# Altium PCB FogCalBoard.PcbDoc (part 1 of 2)
Units mil, origin at the board's own origin, x right, y up, seen from the top; angles counter-clockwise.
Board outline 2750 x 2750 mil, 4 copper layers (Top Layer, Middle 1 Layer, Middle 2 Layer, Bottom Layer), stack 53.912 mil thick; 111 components, 90 nets, 358 pads, 105 vias.
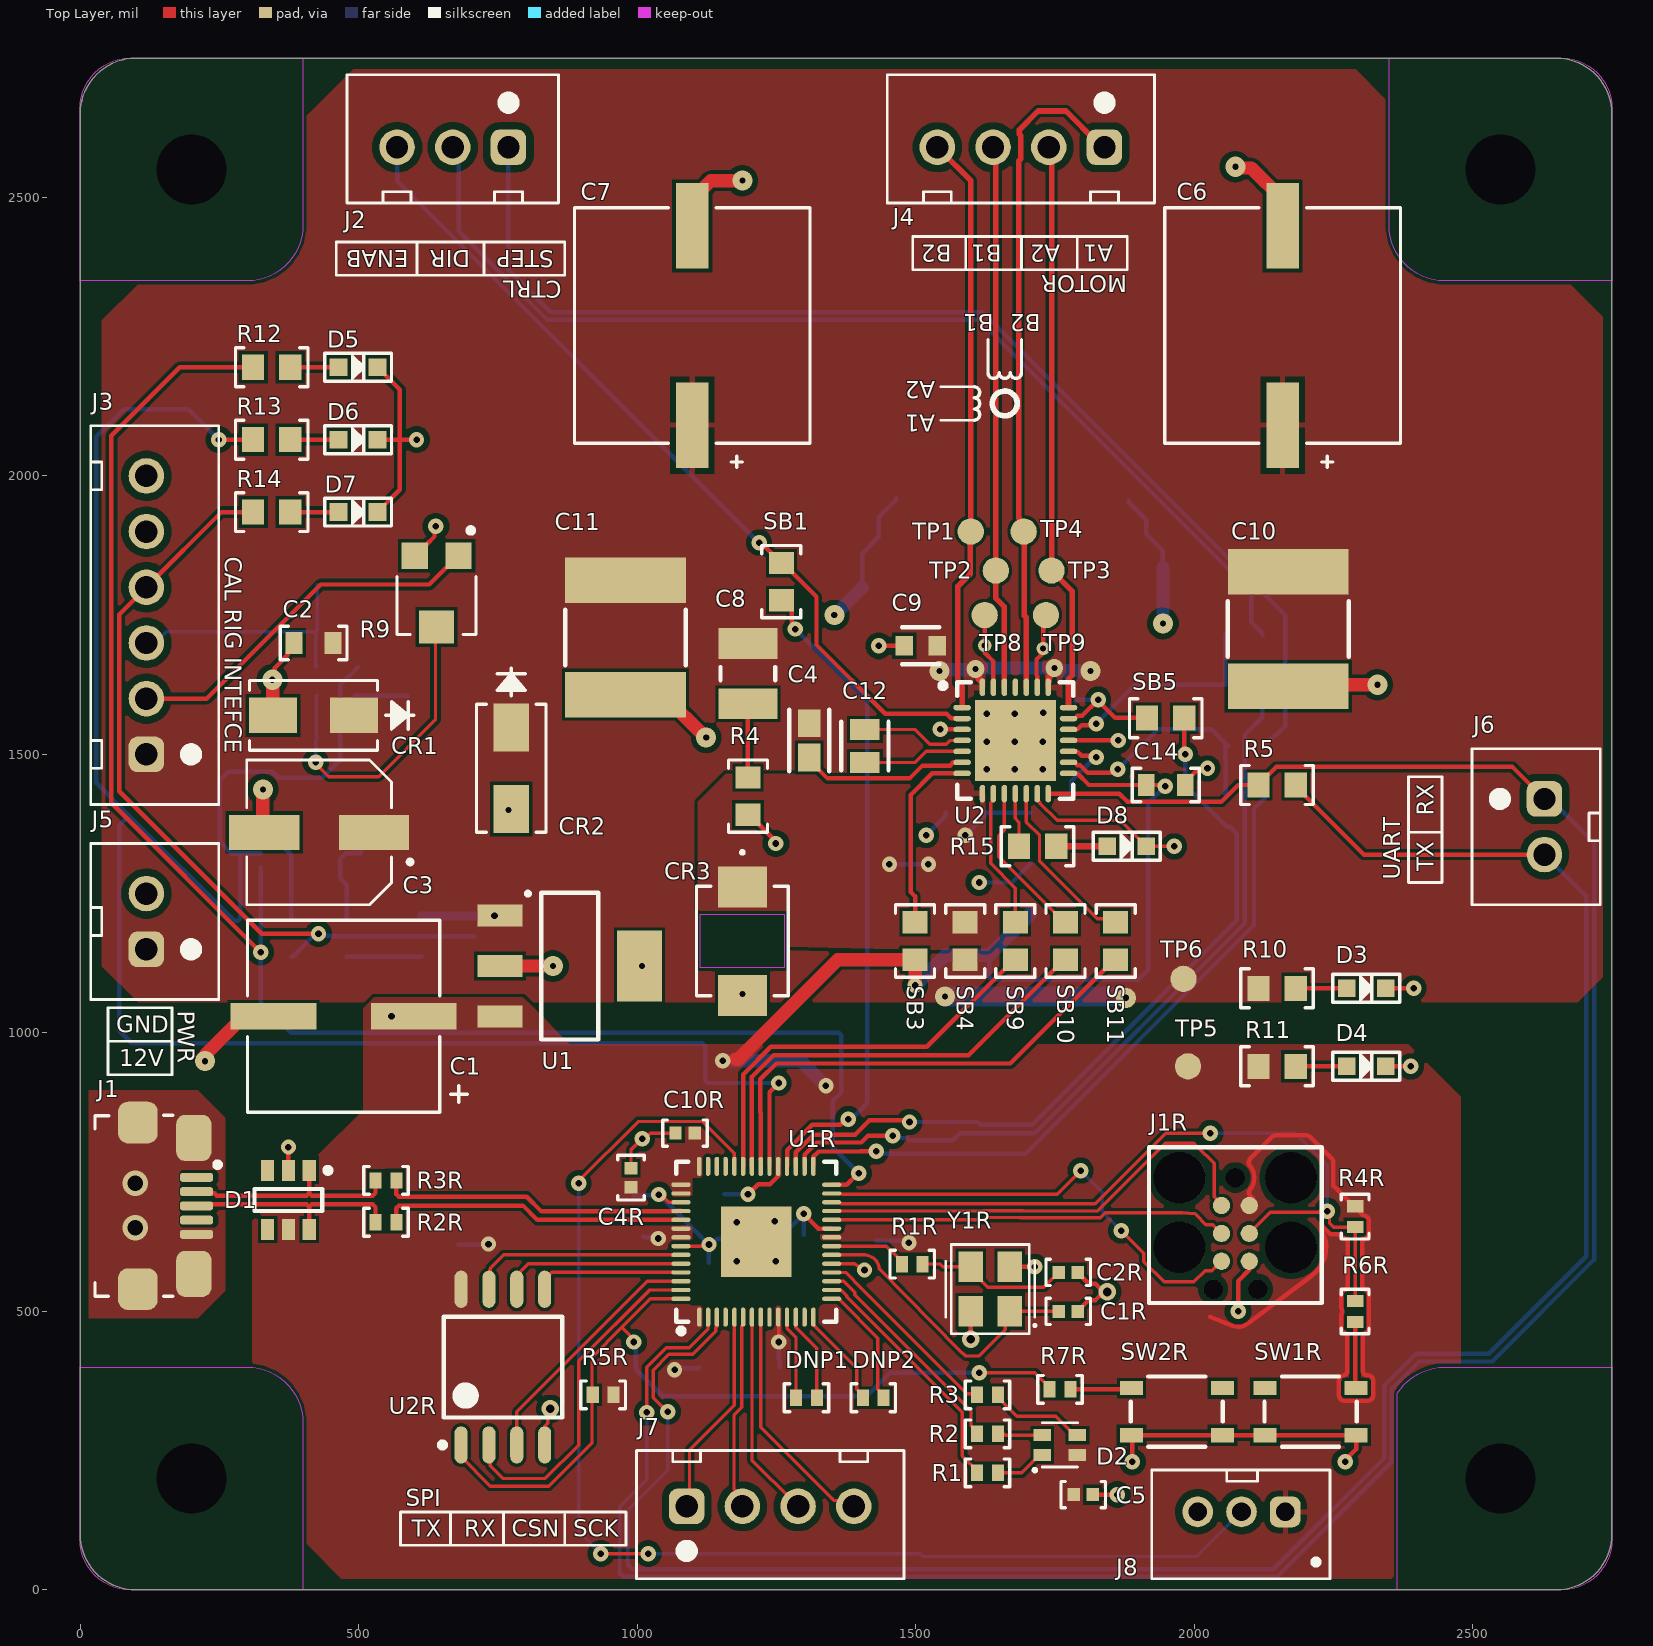
[diagram p0: Top Layer view]
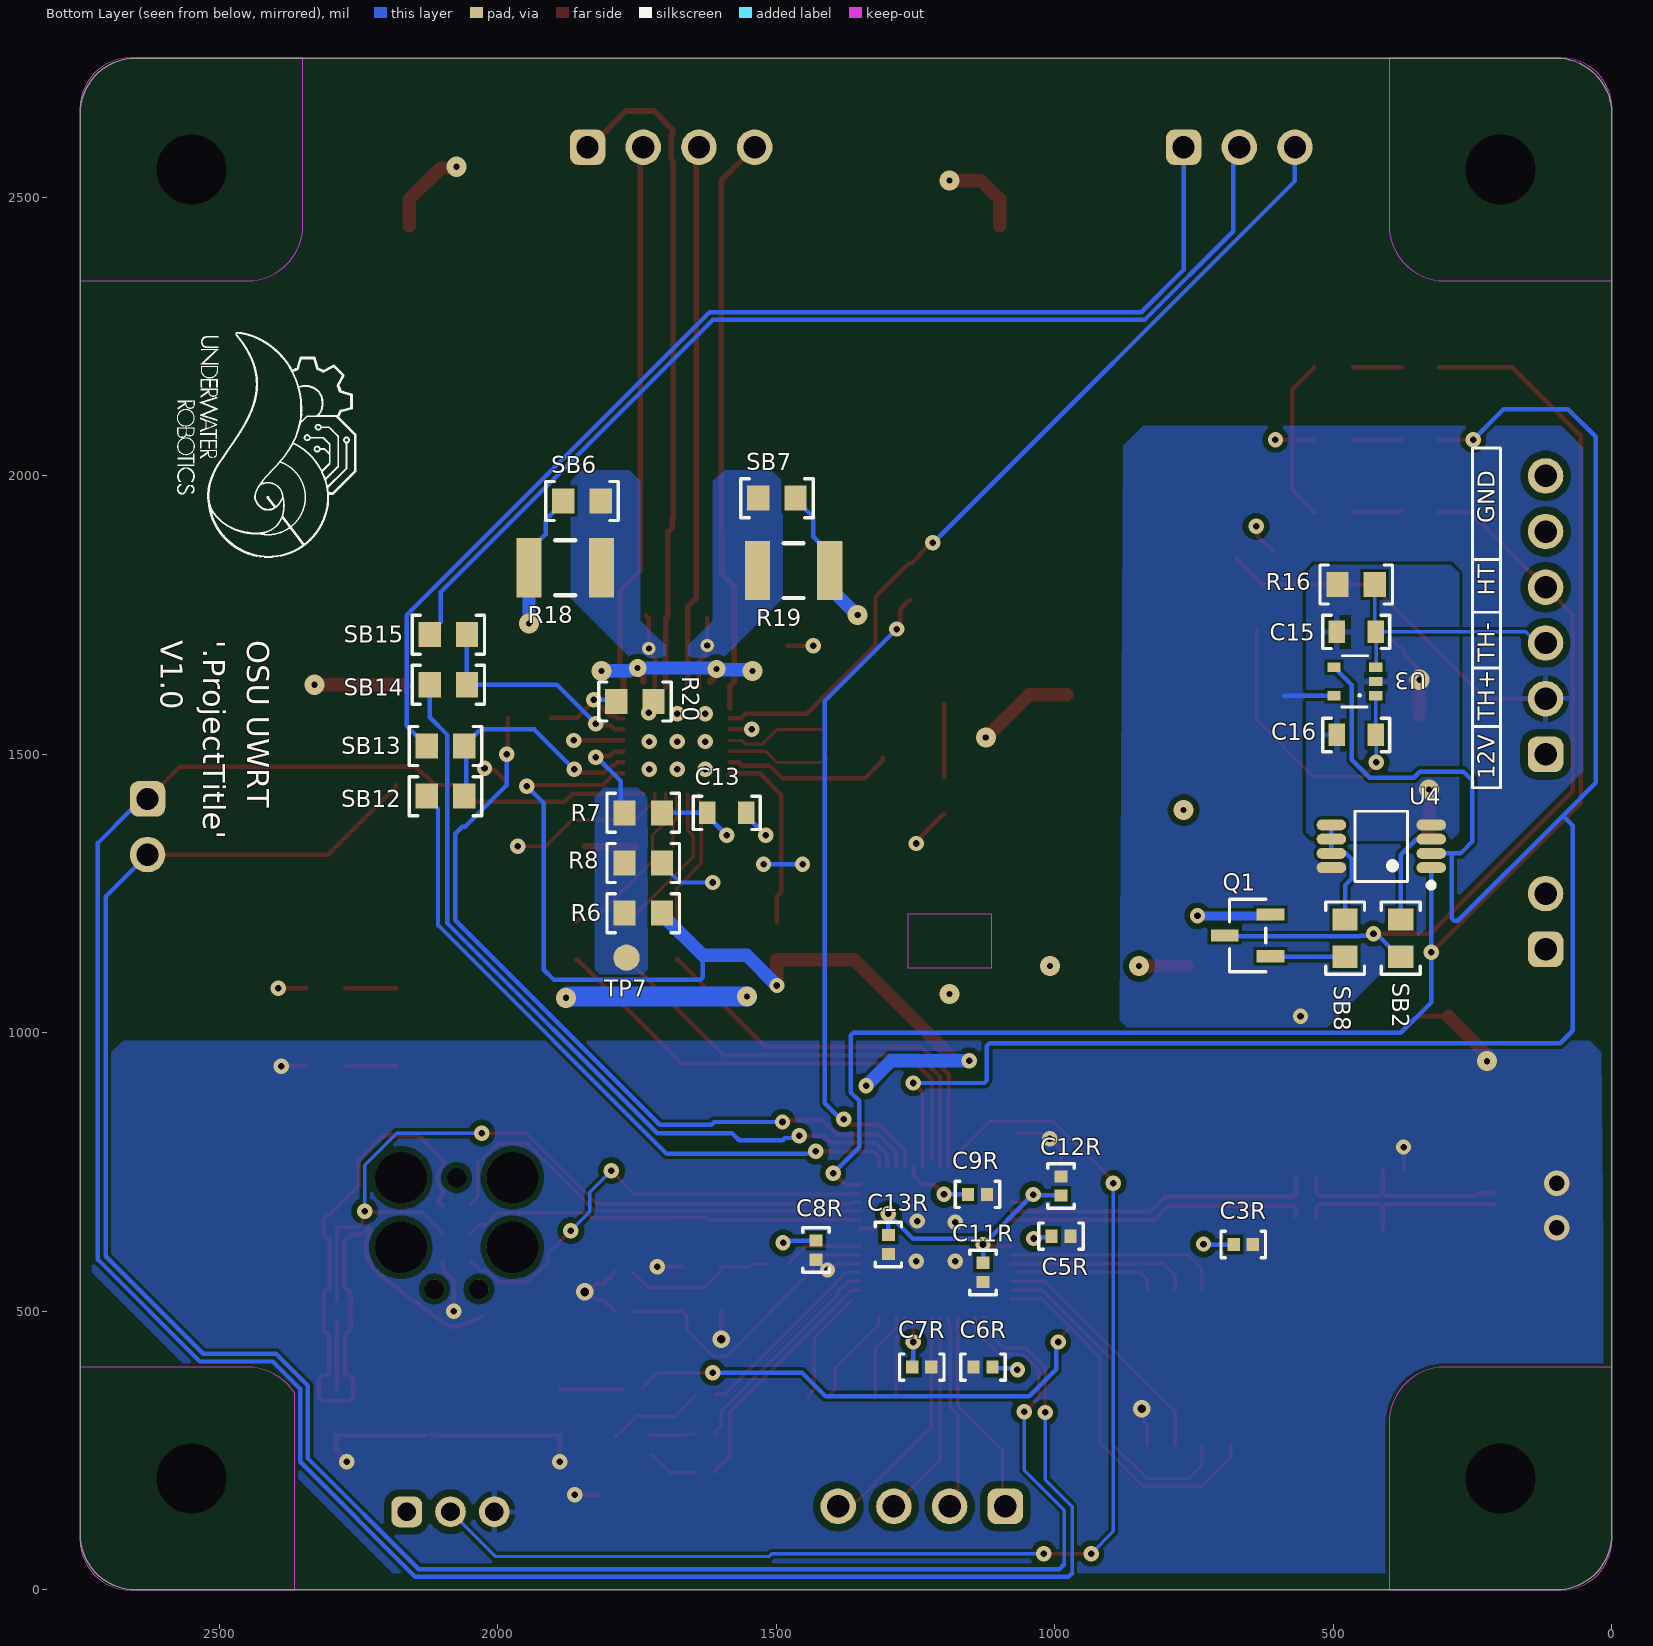
[diagram p1: Bottom Layer view, seen from below]
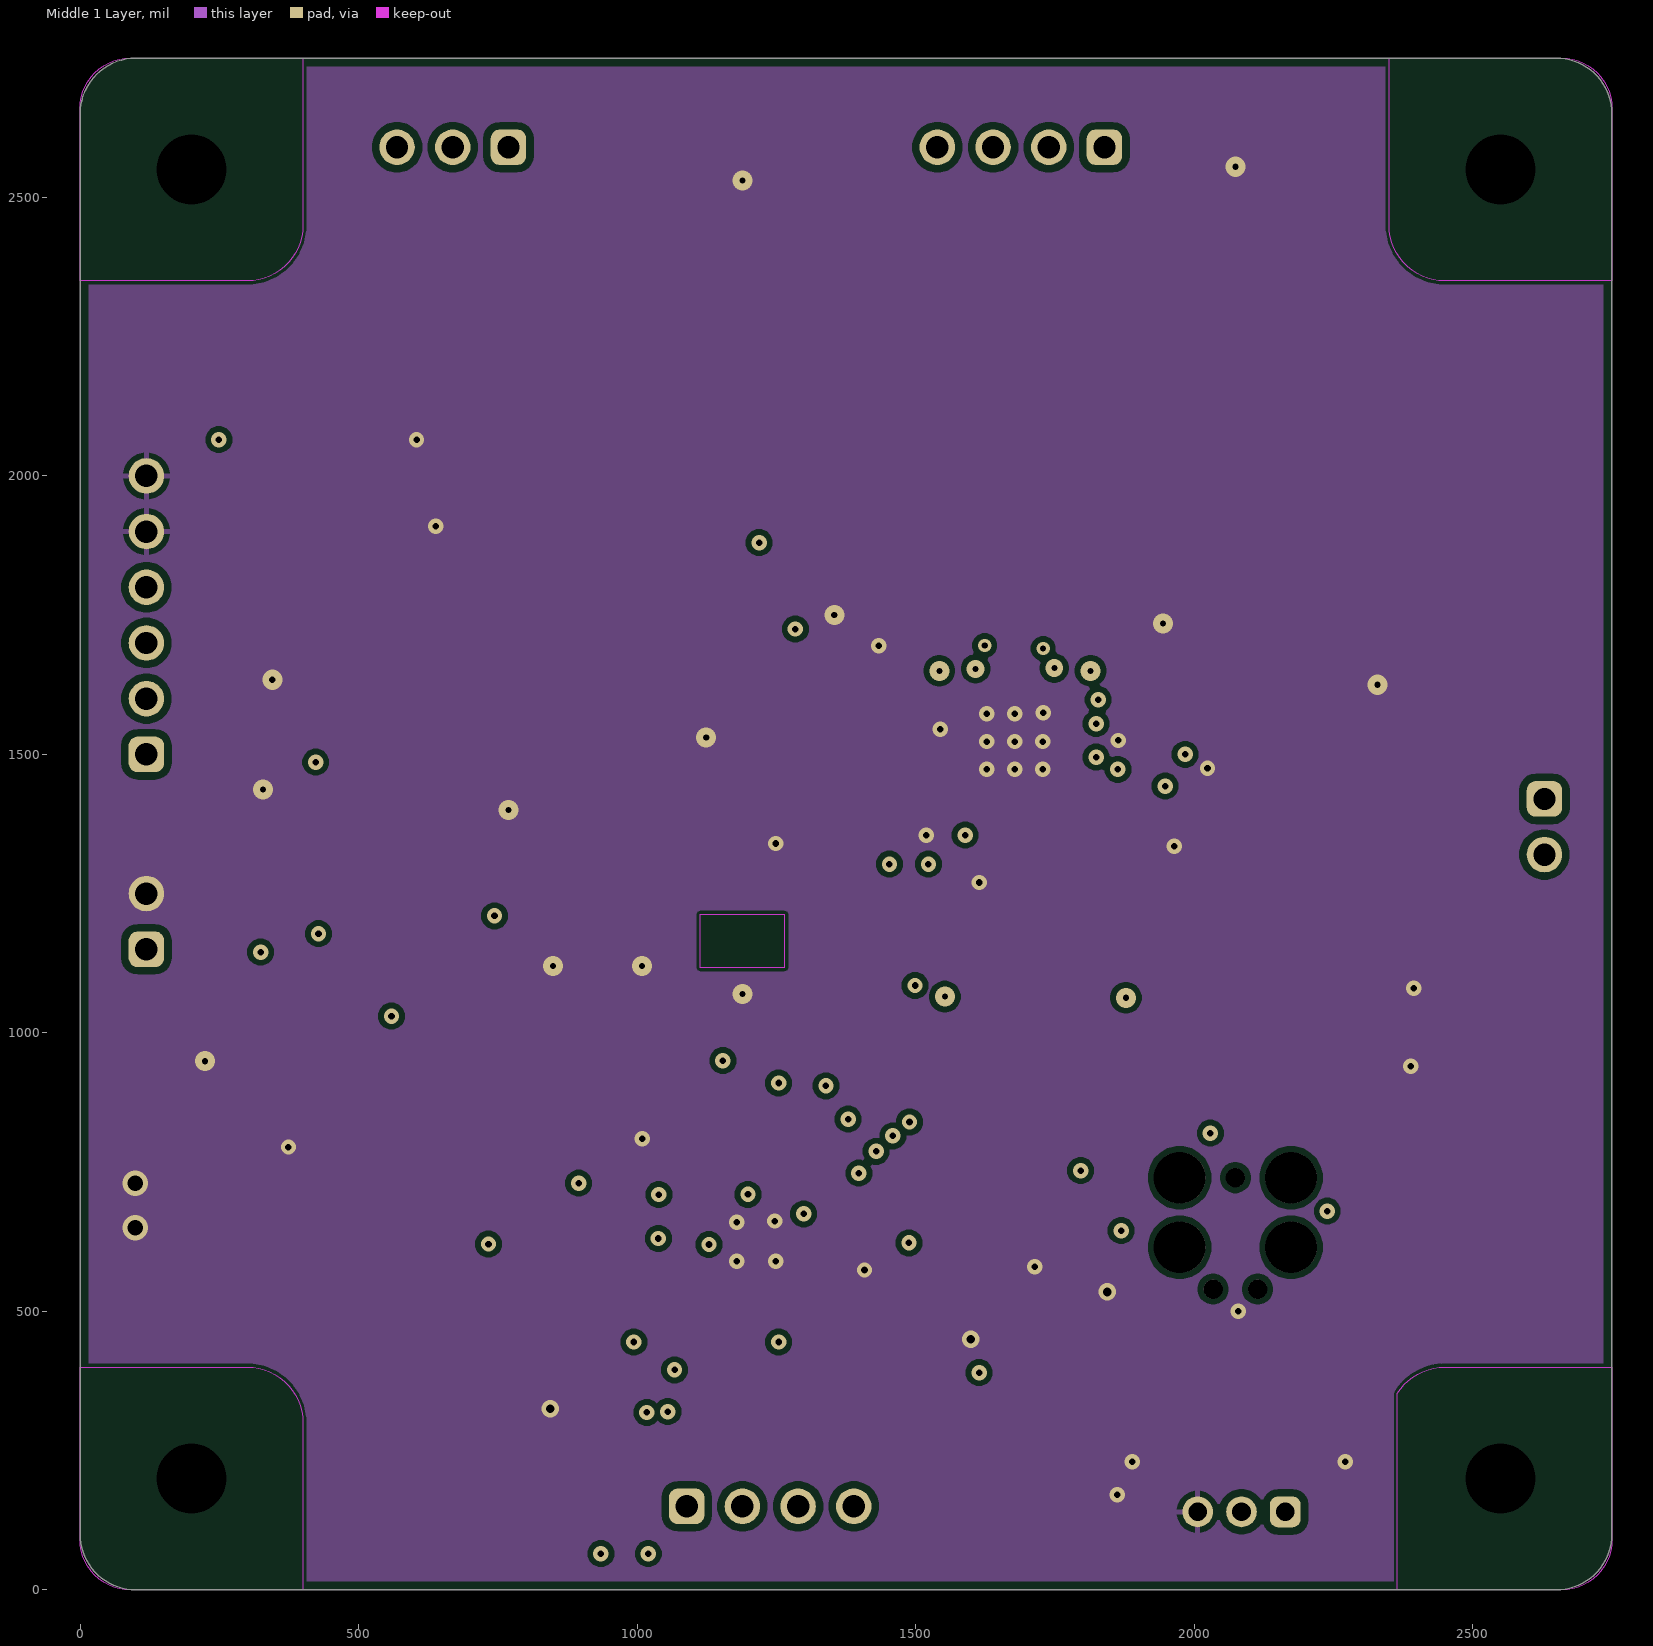
[diagram p2: Middle 1 Layer]
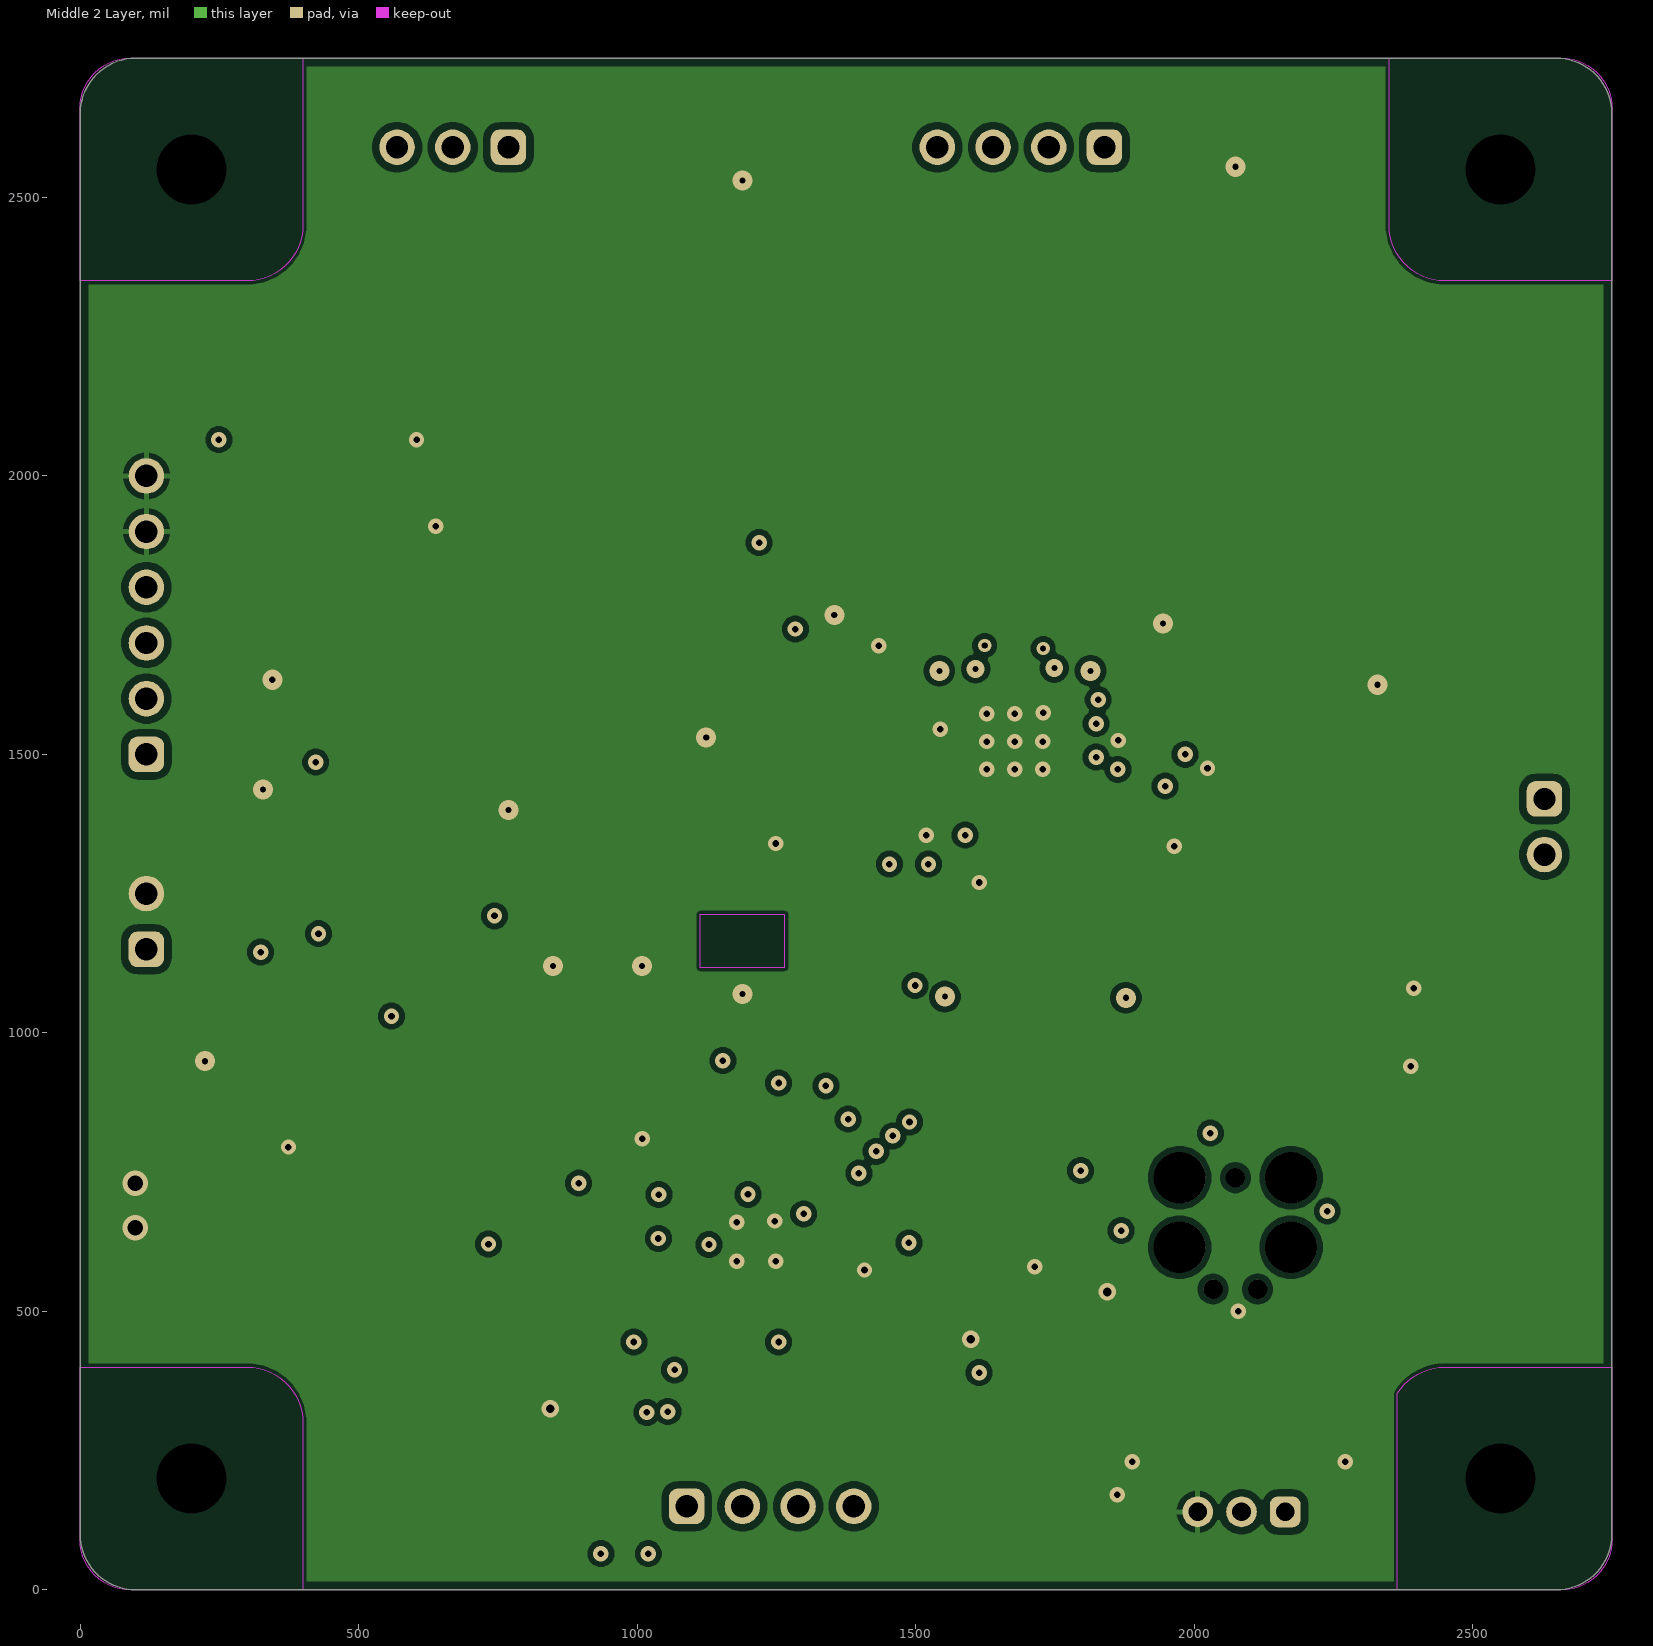
[diagram p3: Middle 2 Layer]
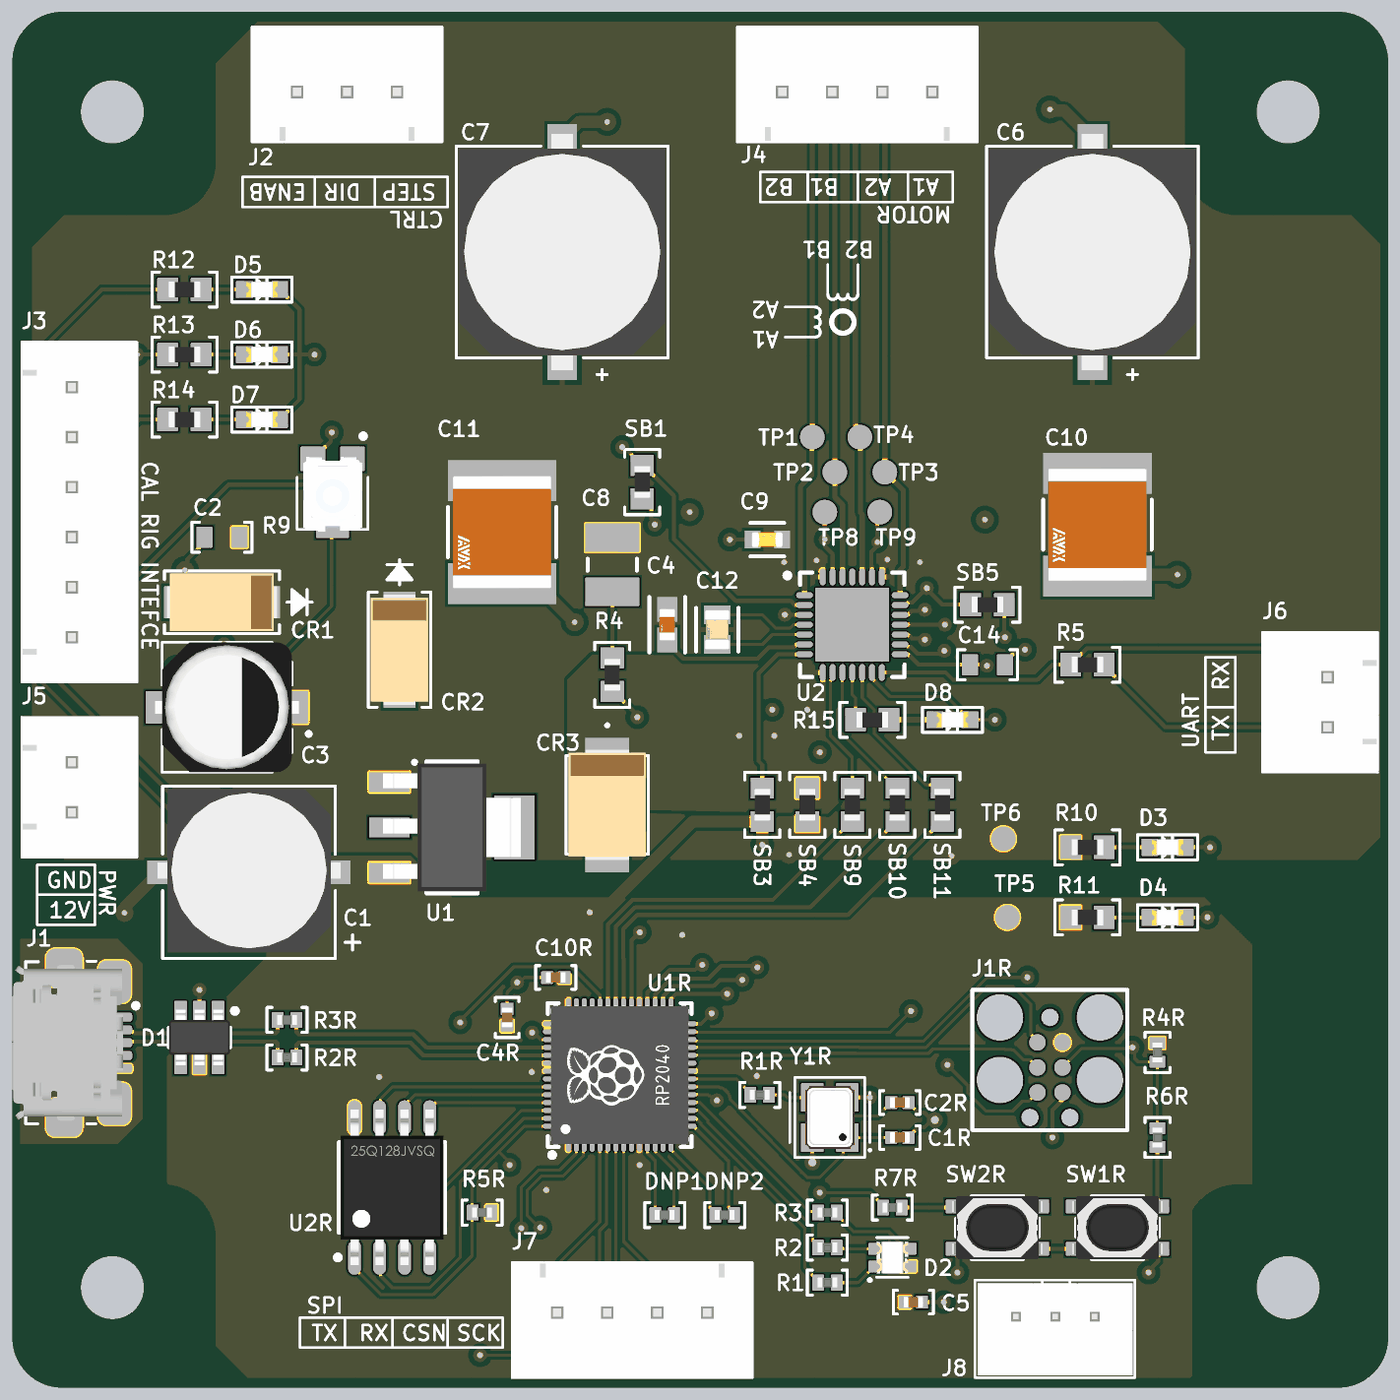
[diagram p5: 3D render of the assembled board from above, using the file's embedded part models]
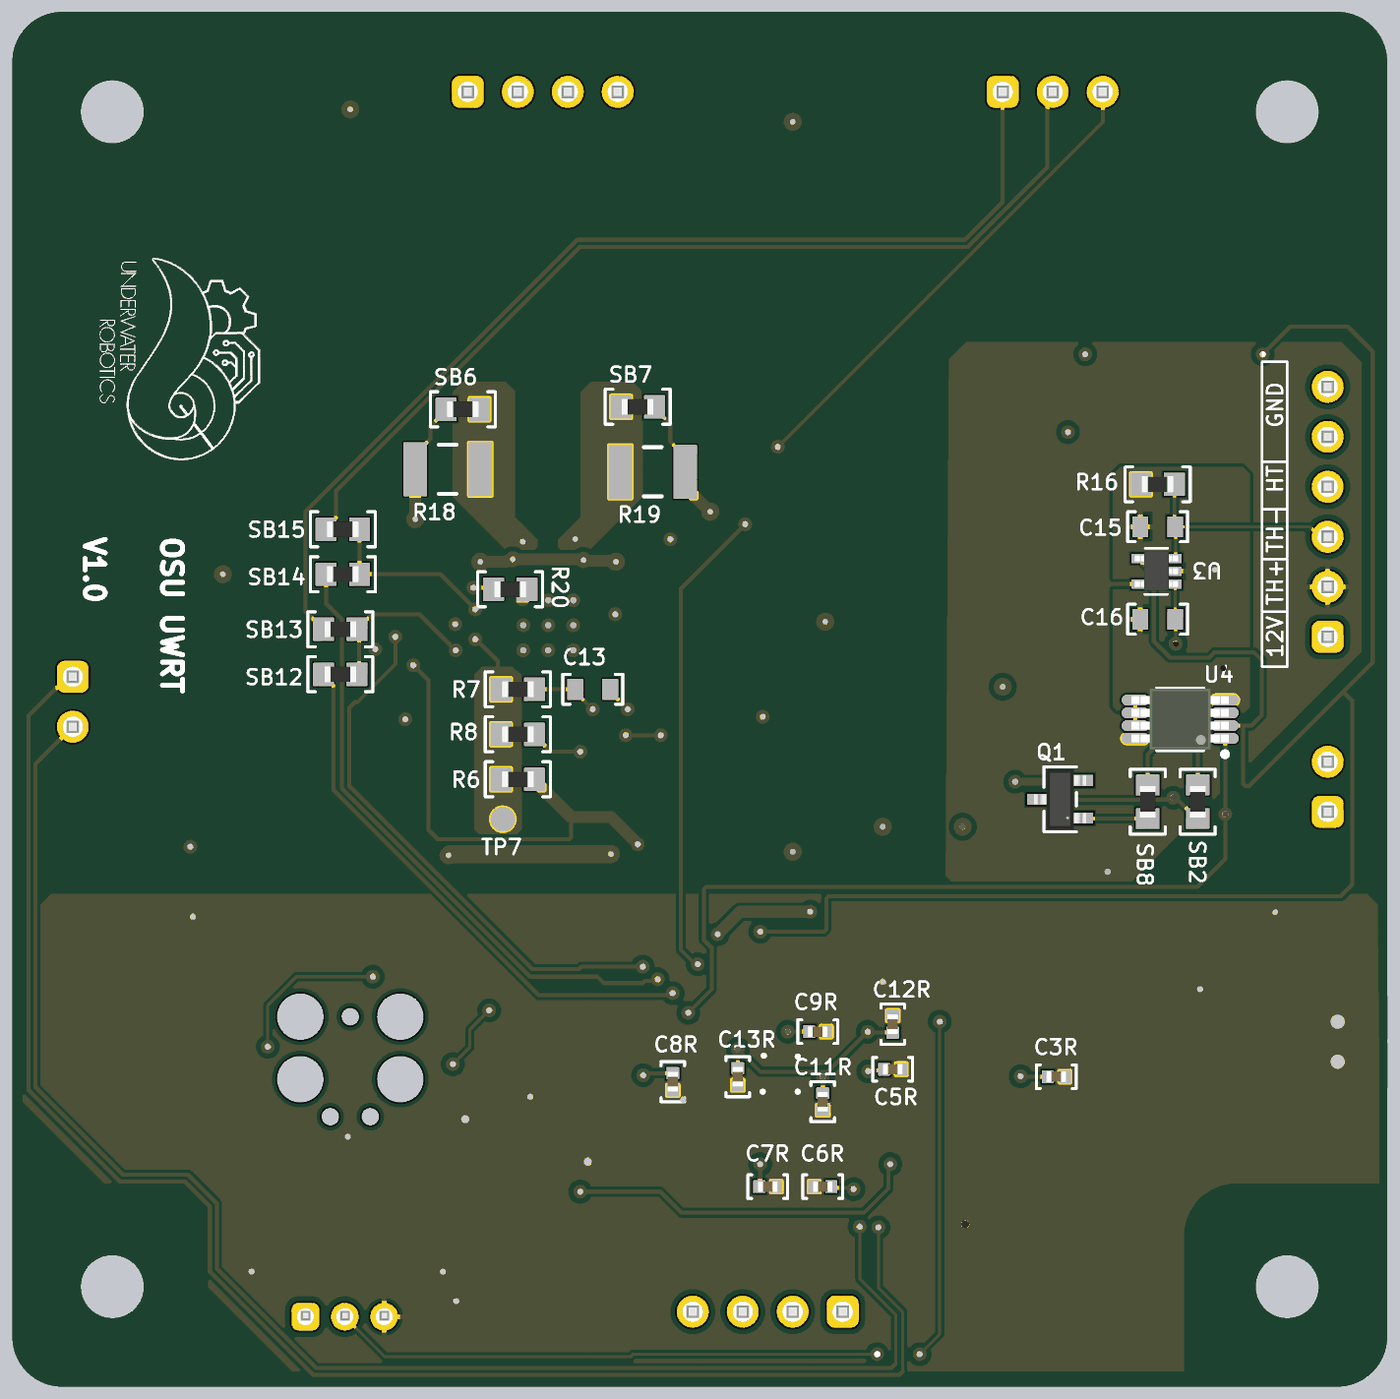
[diagram p6: 3D render of the assembled board from below, using the file's embedded part models]

## Layer stack, top to bottom
Top Solder: solder mask 1, SM-001, Dk 4
Top Layer: signal copper 1.378
Dielectric 1: prepreg 5.1, PP-017, Dk 4.3
Dielectric 2: prepreg 5.1, PP-017, Dk 4.3
Middle 1 Layer: signal copper 1.378
Dielectric 3: core 28, Core-039, Dk 4.8
Middle 2 Layer: signal copper 1.378
Dielectric 4: prepreg 5.1, PP-017, Dk 4.3
Dielectric 5: prepreg 5.1, PP-017, Dk 4.3
Bottom Layer: signal copper 1.378
Bottom Solder: solder mask 1, SM-001, Dk 4

## Board outline
100,0 cw(c100,100) 0,100 0,2650 cw(c100,2650) 100,2750 2650,2750 cw(c2650,2650) 2750,2650 2750,100 cw(c2650,100) 2650,0

## Design rules (kind name [scope] priority, off if disabled: settings)
AcuteAngle [All] p1: minimum=7.00000000000000E+0001 checktracksonly=FALSE
BoardOutlineClearance [All] p1: gap=15 ignorepadtopadclearanceinfootprint=FALSE
Clearance "Clearance JLCPCB" [All] p1: gap=6 ignorepadtopadclearanceinfootprint=FALSE except(5: SMDPad-SMDPad; 10: Arc-Via Arc-Hole Track-Via Track-Hole Via-Via Via-Fill Via-Poly Via-Region Fill-Hole Poly-Hole Region-Hole; 13: Arc-THPad Track-THPad THPad-Fill THPad-Poly THPad-Region; 20: THPad-THPad)
ComponentOrientations [All] p1: allowedrotations=32
DiffPairsRouting CAN [All] p1: maxlimit=10 minlimit=8 mostfreqgap=10 toplayer_maxgap=8 toplayer_prefgap=8 toplayer_minwidth=8 toplayer_maxwidth=8 toplayer_prefwidth=8 midlayer1_minwidth=15 midlayer1_maxwidth=15 midlayer1_prefwidth=15 midlayer2_minwidth=15 midlayer2_maxwidth=15 midlayer2_prefwidth=15 bottomlayer_maxgap=8 bottomlayer_prefgap=8 bottomlayer_minwidth=8 bottomlayer_maxwidth=8 bottomlayer_prefwidth=8 impedanceprofiledriven=TRUE maxuncoupledlength=500
DiffPairsRouting "USB 2.0" [InDifferentialPairClass('USB 2.0')] p2: maxlimit=6 minlimit=6 mostfreqgap=6 toplayer_minwidth=15 toplayer_maxwidth=15 toplayer_prefwidth=15 midlayer1_minwidth=2.53 midlayer1_maxwidth=2.53 midlayer1_prefwidth=2.53 midlayer2_minwidth=2.53 midlayer2_maxwidth=2.53 midlayer2_prefwidth=2.53 bottomlayer_minwidth=15 bottomlayer_maxwidth=15 bottomlayer_prefwidth=15 maxuncoupledlength=500
DiffPairsRouting ETH [All] p3 off: maxlimit=10 minlimit=4 mostfreqgap=10 toplayer_maxgap=4 toplayer_prefgap=4 toplayer_minwidth=8 toplayer_maxwidth=8 toplayer_prefwidth=8 midlayer1_minwidth=15 midlayer1_maxwidth=15 midlayer1_prefwidth=15 midlayer2_minwidth=15 midlayer2_maxwidth=15 midlayer2_prefwidth=15 bottomlayer_maxgap=4 bottomlayer_prefgap=4 bottomlayer_minwidth=8 bottomlayer_maxwidth=8 bottomlayer_prefwidth=8 impedanceprofiledriven=TRUE maxuncoupledlength=500
FanoutControl Fanout_Default [All] p5: bgadir=Out bgaviamode=Centered fanoutstyle=Auto fanoutdirection=OutOnly viagrid=1 // Fanout_Default (Default Rule)
HoleSize "HoleSize JLCPCB" [All] p1: absolutevalues=TRUE maxlimit=245 minlimit=8 maxpercent=80.000 minpercent=20.000
HoleToHoleClearance "HoleToHoleClearance JLCPCB" [All] p1: gap=20 allowstackedmicrovias=TRUE
MinimumAnnularRing "MinimumAnnularRing JLCPCB" [All] p1: minimumring=6
MinimumSolderMaskSliver "MinimumSolderMaskSliver JLCPCB" [All] p1: minsoldermaskwidth=1
PasteMaskExpansion [All] p1: expansion=1
PolygonConnect [All] p1: connectstyle=Relief reliefconductorwidth=10 reliefentries=4 polygonreliefangle="90 Angle" airgapwidth=10
RoutingLayers [All] p1: top layer_v5=TRUE mid layer 1_v5=FALSE mid layer 2_v5=FALSE bottom layer_v5=TRUE
RoutingVias "RoutingVias JLCPCB" [All] p1: holewidth=10 width=22 viastyle="Through Hole" minholewidth=8 minwidth=20 maxholewidth=28 maxwidth=40
SMDEntry [All] p1 off: side=TRUE corner=TRUE anyangle=FALSE
SMDToCorner [All] p1: distance=0
SMDToPlane [All] p1: distance=0
SilkToSilkClearance "SilkToSilkClearance JLCPCB" [All] p1: silktosilkclearance=3
SilkToSolderMaskClearance "SilkToSolderMaskClearance JLCPCB" [IsPad] p1: minsilkscreentomaskgap=6 clearancetoexposedcopper=TRUE
SolderMaskExpansion [All] p1: expansion=4 istentingtop=FALSE
SupplyNets "Schematic Supply Nets_3" [InNet('3V3')] p1: voltage=0.000
SupplyNets "Schematic Supply Nets_2" [InNet('+12')] p2: voltage=0.000
SupplyNets "Schematic Supply Nets_1" [InNet('GND')] p3: voltage=0.000
SupplyNets "Schematic Supply Nets" [InNet('MC5V')] p4: voltage=0.000
UnRoutedNet [All] p1: checkbadconnections=TRUE
Width "Width JLCPCB" [All] p1: maxlimit=100 minlimit=6 preferedwidth=10
20 further rules are at their usual default settings.

## Classes and differential pairs
differential pair class "USB 2.0": USB USB_RP2040
component class U_RP2040_C: C1R C2R C3R C4R C5R C6R C7R C8R C9R C10R C11R C12R C13R J1R R1R R2R R3R R4R R5R R6R R7R SW1R SW2R U1R U2R Y1R
component class FogCalBoard: C1 C2 C3 C4 C5 C6 C7 C8 C9 C10 C11 C12 C13 C14 C15 C16 CR1 CR2 CR3 D1 D2 D3 D4 D5 D6 D7 D8 DNP1 DNP2 J1 J2 J3 J4 J5 J6 J7 J8 Q1 R1 R2 R3 R4 R5 R6 R7 R8 R9 R10 R11 R12 R13 R14 R15 R16 R18 R19 R20 SB1 SB2 SB3 SB4 SB5 SB6 SB7 SB8 SB9 SB10 SB11 SB12 SB13 SB14 SB15 TP1 TP2 TP3 TP4 TP5 TP6 TP7 TP8 TP9 U1 U2 U3 U4
differential pair USB: +USB_P -USB_N
differential pair USB_RP2040: +USB_RP2040_P -USB_RP2040_N

## Components (designator, comment, footprint, x,y, rotation, side; value= is the part's Value field where it differs from the comment)
C1 "22uF electrolytic 35 V" PCAP_8x5.4-ELECT_NCA 473,1030 r180 top value=22uF
C1R "27pF Ceramic 50V" CAPACITOR_0402 1774,500 r0 top value=27pF
C2 "100nF Ceramic 25V" CAPACITOR_0603 419,1700 r0 top value=0.1uF
C2R "27pF Ceramic 50V" CAPACITOR_0402 1774,570 r0 top value=27pF
C3 "10uF electrolytic 63V" CAP_EEHZC1J100P 429,1360 r180 top value=10uF
C3R "100nF Ceramic 6.3V" CAPACITOR_0402 661.87,620 r180 bottom value=0.1uF
C4 "100n" FP-CC0603-DA-IPC_A 1309,1525 r90 top
C4R "1uF Ceramic 16V" CAPACITOR_0402 989,740 r90 top value=1uF
C5 "1uF Ceramic 16V" CAPACITOR_0402 1801,171 r0 top value=1uF
C5R "100nF Ceramic 6.3V" CAPACITOR_0402 989,635 r180 bottom value=0.1uF
C6 "EEE-FT1H331AP" CAP_EEE-FT1H331AP 2159,2270 r90 top value=330u
C6R "100nF Ceramic 6.3V" CAPACITOR_0402 1129,400 r0 bottom value=0.1uF
C7 "EEE-FT1H331AP" CAP_EEE-FT1H331AP 1099,2270 r90 top value=330u
C7R "100nF Ceramic 6.3V" CAPACITOR_0402 1239,400 r180 bottom value=0.1uF
C8 "1u" CAPC1210(3225)220_N 1199,1645 r90 top value=1uF
C8R "100nF Ceramic 6.3V" CAPACITOR_0402 1429,610 r270 bottom value=0.1uF
C9 "0.1u" FP-CC0603-DA-MFG 1509,1695 r180 top value="100 nF"
C9R "100nF Ceramic 6.3V" CAPACITOR_0402 1139,710 r180 bottom value=0.1uF
C10 "10u" FP-2220-L_5_7_0_5-W_5_0_4-IPC_A 2169,1725 r270 top
C10R "100nF Ceramic 6.3V" CAPACITOR_0402 1086.13,820 r180 top value=0.1uF
C11 "10u" FP-2220-L_5_7_0_5-W_5_0_4-IPC_A 979,1710 r270 top
C11R "1uF Ceramic 16V" CAPACITOR_0402 1129,570 r270 bottom value=1uF
C12 "22n" FP-C0805C-DN-MFG 1409,1515 r90 top value="22,000 pF"
C12R "100nF Ceramic 6.3V" CAPACITOR_0402 989,725 r90 bottom value=0.1uF
C13 "GRT188R61H225KE13D" CAPACITOR_0603 1589,1395 r180 bottom value=2.2u
C13R "100nF Ceramic 6.3V" CAPACITOR_0402 1299,620 r270 bottom value=0.1uF
C14 "CC0603KRX7R9B1B10" CAPACITOR_0603 1949,1445 r0 top
C15 "1uF Ceramic 16V" CAPACITOR_0603 459,1720 r0 bottom value=1uF
C16 "1uF Ceramic 16V" CAPACITOR_0603 459,1535 r0 bottom value=1uF
CR1 "SMAJP4KE18A-TP" DO-214AC 419,1570 r180 top
CR2 "SMAJP4KE18A-TP" DO-214AC 774,1475 r270 top
CR3 "SMBJ5.0A" DO-214AA 1189,1165 r270 top
D1 "TVS DIODE 5VWM 25VC SOT23-6" "SOT 23-6L" 374,700 r270 top
D2 "EAST1616RGBB4" LED_0606_4SMD 1759,260 r0 top
D3 "IN-S63AT5G" LED_0603 2309,1080 r0 top
D4 "IN-S63AT5G" LED_0603 2309,940 r0 top
D5 "150060YS75000" LED_0603 499,2195 r0 top
D6 "150060YS75000" LED_0603 499,2065 r0 top
D7 "150060YS75000" LED_0603 499,1935 r0 top
D8 "150060RS75000" LED_0603 1879,1335 r0 top
DNP1 "DNP" RESISTOR_0402 1304,345 r0 top
DNP2 "DNP" RESISTOR_0402 1424,345 r0 top
J1 "USB_MICRO R/A" CONN_MINIUSB 103.68,689.41 r270 top
J1R "TagConnect SWD" TC2030-MCP 2074,740 r270 top
J2 "XH2.54 VERT" CONN_JST_XH254_3POS_VERT 769,2590 r180 top
J3 "XH2.54 VERT" CONN_JST_XH254_6POS_VERT 119,1500 r90 top
J4 "XH2.54 VERT" CONN_JST_XH254_4POS_VERT 1839,2590 r180 top
J5 "XH2.54 VERT" CONN_JST_XH254_2POS_VERT 119,1150 r90 top
J6 "XH2.54 VERT" CONN_JST_XH254_2POS_VERT 2629,1420 r270 top
J7 "XH2.54 VERT" CONN_JST_XH254_4POS_VERT 1089,150 r0 top
J8 "JST PH 3 Pos Vertical" CONN_JST_PH_3POS_VERT 2163.74,140 r180 top
Q1 "MOSFET P-CHANNEL 20V 4.7A SOT23" SOT-23-3 654,1175 r90 bottom
R1 "604 Ohm 1% 1/16W" RESISTOR_0402 1629,210 r0 top
R1R "1k Ohm 1% 1/16W" RESISTOR_0402 1494,585 r0 top
R2 "200 Ohm 1% 1/16W" RESISTOR_0402 1629,280 r0 top
R2R "27 Ohm 1% 1/16W" RESISTOR_0402 549,660 r0 top
R3 "200 Ohm 1% 1/16W" RESISTOR_0402 1629,350 r0 top
R3R "27 Ohm 1% 1/16W" RESISTOR_0402 549,735 r0 top
R4 "CRCW06031R10FKEA" RESISTOR_0603 1199,1425 r90 top value=1.1
R4R "10k Ohm 1% 1/16W" RESISTOR_0402 2289,670 r270 top
R5 "RMCF0603FT1K00" RESISTOR_0603 2149,1445 r0 top value=1K
R5R "10k Ohm 1% 1/16W" RESISTOR_0402 939,350 r180 top
R6 "1k Ohm 5% 1/8W" RESISTOR_0603 1739,1215 r0 bottom
R6R "1k Ohm 1% 1/16W" RESISTOR_0402 2289,500 r90 top
R7 "1k Ohm 5% 1/8W" RESISTOR_0603 1739,1395 r0 bottom
R7R "1k Ohm 1% 1/16W" RESISTOR_0402 1759,360 r180 top
R8 "1k Ohm 5% 1/8W" RESISTOR_0603 1739,1305 r0 bottom
R9 "TC33X-2-203E" TRIM_TC33X-2-203E 640,1786 r270 top
R10 "4.7k Ohm 5% 1/10W" RESISTOR_0603 2149,1080 r0 top
R11 "4.7k Ohm 5% 1/10W" RESISTOR_0603 2149,940 r0 top
R12 "220 Ohm 5% 1/8W" RESISTOR_0603 344,2195 r0 top
R13 "220 Ohm 5% 1/8W" RESISTOR_0603 344,2065 r0 top
R14 "220 Ohm 5% 1/8W" RESISTOR_0603 344,1935 r0 top
R15 "220 Ohm 5% 1/8W" RESISTOR_0603 1719,1335 r0 top
R16 "RES 1.24K OHM 1% 1/10W 0603" RESISTOR_0603 459,1805 r0 bottom
R18 "RCWE1210R120FKEA" RESISTOR_1210 1879,1835 r0 bottom value=120m
R19 "RCWE1210R120FKEA" RESISTOR_1210 1469,1830 r180 bottom value=120m
R20 "100k Ohm 5% 1/8W" RESISTOR_0603 1754,1595 r180 bottom
SB1 "0 Ohm Jumper No Fit" RESISTOR_0603 1259,1810 r90 top
SB2 "0 Ohm Jumper No Fit" RESISTOR_0603 379,1170 r90 bottom
SB3 "0 Ohm Jumper No Fit" RESISTOR_0603 1499,1165 r270 top
SB4 "0 Ohm Jumper No Fit" RESISTOR_0603 1589,1165 r270 top
SB5 "0 Ohm Jumper No Fit" RESISTOR_0603 1949,1565 r180 top
SB6 "0 Ohm Jumper No Fit" RESISTOR_0603 1849,1955 r0 bottom
SB7 "0 Ohm Jumper No Fit" RESISTOR_0603 1499,1960 r180 bottom
SB8 "0 Ohm Jumper No Fit" RESISTOR_0603 479,1170 r270 bottom
SB9 "0 Ohm Jumper No Fit" RESISTOR_0603 1679,1165 r270 top
SB10 "0 Ohm Jumper No Fit" RESISTOR_0603 1769,1165 r270 top
SB11 "0 Ohm Jumper No Fit" RESISTOR_0603 1859,1165 r270 top
SB12 "0 Ohm Jumper No Fit" RESISTOR_0603 2094,1425 r0 bottom
SB13 "0 Ohm Jumper No Fit" RESISTOR_0603 2094,1515 r0 bottom
SB14 "0 Ohm Jumper No Fit" RESISTOR_0603 2089,1625 r0 bottom
SB15 "0 Ohm Jumper No Fit" RESISTOR_0603 2089,1715 r0 bottom
SW1R "434123025826" SMD_434123025826 2209,320 r0 top
SW2R "434123025826" SMD_434123025826 1969,320 r0 top
TP1 "PCB Test Point" TESTPOINT_1.2MM 1599,1900 r0 top
TP2 "PCB Test Point" TESTPOINT_1.2MM 1644,1830 r0 top
TP3 "PCB Test Point" TESTPOINT_1.2MM 1744,1830 r0 top
TP4 "PCB Test Point" TESTPOINT_1.2MM 1694,1900 r0 top
TP5 "PCB Test Point" TESTPOINT_1.2MM 1989,940 r0 top
TP6 "PCB Test Point" TESTPOINT_1.2MM 1981,1097 r0 top
TP7 "PCB Test Point" TESTPOINT_1.2MM 1769,1135 r180 bottom
TP8 "PCB Test Point" TESTPOINT_1.2MM 1624,1750 r0 top
TP9 "PCB Test Point" TESTPOINT_1.2MM 1734,1750 r0 top
U1 "IC REG LIN" SOT-223-4 879,1120 r0 top
U1R "RP2040" "QFN-56 RP2040" 1214,625 r90 top
U2 "TMC2209-LA-T" QFN-28 1679,1525 r0 top
U2R "W25Q128JVSIQ" "SOIC-8 W25QxJV" 759,400 r90 top
U3 "IC COMPARATOR 1 GEN PUR SC70-5" SOT-353 424,1631 r90 bottom
U4 "IC GATE NAND SCHMITT 2CH 2IN SM8" MSOP-8_PI4ULS5V202UEX 414,1335 r0 bottom
Y1R "CRYSTAL 12.0000MHZ 18PF SMD" "4-SMD, NO LEAD CRYSTAL 3.2x2.5mm" 1669,500 r90 top

## Footprints (in the part's own frame and the unit in brackets; to place one, negate y for a bottom-side part, rotate by r counter-clockwise, add the part's x,y. Pads: shape width x height; smd on the part's side, far side on the other; paste and mask are expansions set on the pad)
"4-SMD, NO LEAD CRYSTAL 3.2x2.5mm" [mm]
  rrect0% 1.4x1.1 smd: 1(0,0) 2(2.032,0) 3(2.032,1.778) 4(0,1.778)
  silkscreen extent -1.02,-1.2 3.05,2.92, body extent -0.58,-0.36 2.62,2.14, height 0.82
CAP_EEE-FT1H331AP [mil] "EEE-FT1H331AP"
  rect 154x59 smd paste+0 mask+0: 1(-179,0) 2(179,0)
  silkscreen extent -255,-212 212,212, body extent -236,-206 236,206, height 415
CAP_EEHZC1J100P [mm]
  rect 3.2x1.6 smd: 1(-2.5,0) 2(2.5,0)
  silkscreen extent -4.25,-3.3 3.3,3.3, body extent -3.65,-3.3 3.65,3.3, height 5.8
CAPACITOR_0402 [mm]
  rect 0.56x0.6 smd: 1(-0.435,0) 2(0.435,0)
  silkscreen extent -1.02,-0.6 1.02,0.6, body extent -0.5,-0.28 0.5,0.27, height 0.51
CAPACITOR_0603 [mil] "CAPACITOR 0603"
  rect 30x40 smd: 1(-35,0) 2(35,0)
  silkscreen extent -60,-30 60,30, body extent -31,-16 32,16, height 31
CAPC1210(3225)220_N [mm] "Chip Capacitor, Body 3.2x2.5mm, Height 2.2mm, IPC Medium Density"
  rect 1.4x2.7 smd: 1(-1.375,0) 2(1.375,0)
  silkscreen extent -0.3,-1.25 0.3,1.25, body extent -1.7,-1.35 1.7,1.35, height 2.2
CONN_JST_PH_3POS_VERT [mm]
  rrect50% 1.4x1.4 hole 0.85: 1(0,0)
  round 1.4 hole 0.85: 2(2,0) 3(4,0)
  silkscreen extent -2.03,-1.91 6.1,3.05, body extent -1.92,-1.75 5.94,2.92, height 5.89
CONN_JST_XH254_2POS_VERT [mm] "JST XH 2.54mm Pitch 2 Pos Vertical"
  rrect50% 1.62x1.62 hole 1.02: 1(0,0)
  round 1.62 hole 1.02: 2(2.54,0)
  silkscreen extent -2.29,-3.3 4.83,2.54, body extent -2.34,-3.35 4.88,2.49, height 7.21
CONN_JST_XH254_3POS_VERT [mm] "JST XH 2.54mm Pitch 3 Pos Vertical"
  rrect50% 1.62x1.62 hole 1.02: 1(0,0)
  round 1.62 hole 1.02: 2(2.54,0) 3(5.08,0)
  silkscreen extent -2.29,-3.3 7.37,2.54, body extent -2.34,-3.35 7.42,2.49, height 7.21
CONN_JST_XH254_4POS_VERT [mm] "JST XH 2.54mm Pitch 4 Pos Vertical"
  rrect50% 1.62x1.62 hole 1.02: 1(0,0)
  round 1.62 hole 1.02: 2(2.54,0) 3(5.08,0) 4(7.62,0)
  silkscreen extent -2.29,-3.3 9.91,2.54, body extent -2.34,-3.35 9.96,2.49, height 7.21
CONN_JST_XH254_6POS_VERT [mm] "JST XH 2.54mm Pitch 6 Pos Vertical"
  rrect50% 1.62x1.62 hole 1.02: 1(0,0)
  round 1.62 hole 1.02: 2(2.54,0) 3(5.08,0) 4(7.62,0) 5(10.16,0) 6(12.7,0)
  silkscreen extent -2.29,-3.3 14.99,2.54, body extent -2.34,-3.35 15.04,2.49, height 7.21
CONN_MINIUSB [mm] "USB2.0 Micro-B Receptacle SMD R/A"
  rrect50% 0.4x1.5 smd: 1(-1.3,2.675) 2(-0.65,2.675) 3(0,2.675) 4(0.65,2.675) 5(1.3,2.675)
  rrect50% 2.1x1.6 smd: 6(-3.1,2.55) 7(3.1,2.55)
  rrect50% 1.9x1.8 smd: 8(3.8,0) 9(-3.8,0)
  silkscreen extent -4.14,-1.96 4.11,3.75, body extent -3.96,-2.67 3.96,2.99, height 2.72
DO-214AA [mil]
  rect 74x88 smd paste+0 mask+0: 1(-97,0) 2(98,0)
  Top Layer keep-out region: -48,-75.5 -48,75.5 48,75.5 48,-75.5
  Keep-Out Layer region: -48,-75.5 -48,75.5 48,75.5 48,-75.5
  silkscreen extent -162,-83 99,83, body extent -110,-78 110,78, height 96
DO-214AC [mil]
  rect 86x64 smd paste+0 mask+0: 1(-73,0) 2(73,0)
  silkscreen extent -180,-63 115,63, body extent -110,-57 110,57, height 98
FP-2220-L_5_7_0_5-W_5_0_4-IPC_A [mil]
  rect 81.97x216.66 smd paste+0 mask+0: 1(-102.76,0) 2(102.76,0)
  silkscreen extent -50,-108 50,108, body extent -163,-128 163,128, height 10
FP-C0805C-DN-MFG [mm]
  rect 0.95x1.35 smd paste+0 mask+0: 1(-0.75,0) 2(0.75,0)
  silkscreen extent -1.1,-1.07 1.1,1.07, body extent -1.4,-0.85 1.4,0.85, height 0.25
FP-CC0603-DA-IPC_A [mil]
  rect 49.53x39.85 smd paste+0 mask+0: 1(-30.59,0) 2(30.59,0)
  silkscreen extent -55,-36 55,36, body extent -75,-40 75,40, height 10
FP-CC0603-DA-MFG [mm]
  rect 0.8x0.9 smd paste+0 mask+0: 1(-0.75,0) 2(0.75,0)
  silkscreen extent -0.85,-0.85 0.85,0.85, body extent -1.35,-0.75 1.35,0.75, height 0.25
LED_0603 [mil] "LED 0603"
  rect 32x32 smd: 1(-35,0) 2(35,0)
  silkscreen extent -60,-25 60,25, body extent -31,-16 32,16, height 28
LED_0606_4SMD [mm]
  rrect0% 0.8x0.55 smd: 1(-0.8,-0.45) 2(-0.8,0.45) 3(0.8,0.45) 4(0.8,-0.45)
  silkscreen extent -1.22,-1.22 0.8,1.02, body extent -0.8,-0.8 0.8,0.8, height 0.35
MSOP-8_PI4ULS5V202UEX [mm] "TSOP, 8-Leads, Body 3.00x3.00mm, Pitch 0.65mm, IPC Medium Density"
  oval 1.35x0.5 smd: 1(-2.275,0.975) 2(-2.275,0.325) 3(-2.275,-0.325) 4(-2.275,-0.975) 5(2.275,-0.975) 6(2.275,-0.325) 7(2.275,0.325) 8(2.275,0.975)
  silkscreen extent -2.4,-1.6 1.2,1.9, body extent -2.47,-1.55 2.47,1.55, height 1.06
PCAP_8x5.4-ELECT_NCA [mil]
  rect 154x47 smd paste+0 mask+0: 1(-126,0) 2(126,0)
  silkscreen extent -222,-173 173,173, body extent -183,-167 183,160, height 219
QFN-28 [mm] "QFN, 28-Leads, Body 5.00x5.00mm, Pitch 0.50mm, Thermal Pad 3.70x3.70mm, IPC Medium Density"
  oval 0.8x0.25 smd: 1(-2.425,1.5) 2(-2.425,1) 3(-2.425,0.5) 4(-2.425,0) 5(-2.425,-0.5) 6(-2.425,-1) 7(-2.425,-1.5) 15(2.425,-1.5) 16(2.425,-1) 17(2.425,-0.5) 18(2.425,0) 19(2.425,0.5) 20(2.425,1) 21(2.425,1.5)
  oval 0.25x0.8 smd: 8(-1.5,-2.425) 9(-1,-2.425) 10(-0.5,-2.425) 11(0,-2.425) 12(0.5,-2.425) 13(1,-2.425) 14(1.5,-2.425) 22(1.5,2.425) 23(1,2.425) 24(0.5,2.425) 25(0,2.425) 26(-0.5,2.425) 27(-1,2.425) 28(-1.5,2.425)
  rect 3.7x3.7 smd: 29(0,0)
  silkscreen extent -3.42,-2.65 2.65,2.65, body extent -2.5,-2.5 2.5,2.5, height 0.9
"QFN-56 RP2040" [mm] "QFN, 56-Leads, Body 7.00x7.00mm, Pitch 0.40mm, Thermal Pad 3.10x3.10mm, IPC Medium Density"
  oval 0.875x0.2 smd: 1(-3.437,2.6) 2(-3.437,2.2) 3(-3.437,1.8) 4(-3.437,1.4) 5(-3.437,1) 6(-3.437,0.6) 7(-3.437,0.2) 8(-3.437,-0.2) 9(-3.437,-0.6) 10(-3.437,-1) 11(-3.437,-1.4) 12(-3.437,-1.8) 13(-3.437,-2.2) 14(-3.437,-2.6) 29(3.437,-2.6) 30(3.437,-2.2) 31(3.437,-1.8) 32(3.437,-1.4) 33(3.437,-1) 34(3.437,-0.6) 35(3.437,-0.2) 36(3.437,0.2) 37(3.437,0.6) 38(3.437,1) 39(3.437,1.4) 40(3.437,1.8) 41(3.437,2.2) 42(3.437,2.6)
  oval 0.2x0.875 smd: 15(-2.6,-3.437) 16(-2.2,-3.437) 17(-1.8,-3.437) 18(-1.4,-3.437) 19(-1,-3.437) 20(-0.6,-3.437) 21(-0.2,-3.437) 22(0.2,-3.437) 23(0.6,-3.437) 24(1,-3.437) 25(1.4,-3.437) 26(1.8,-3.437) 27(2.2,-3.437) 28(2.6,-3.437) 43(2.6,3.437) 44(2.2,3.437) 45(1.8,3.437) 46(1.4,3.437) 47(1,3.437) 48(0.6,3.437) 49(0.2,3.437) 50(-0.2,3.437) 51(-0.6,3.437) 52(-1,3.437) 53(-1.4,3.437) 54(-1.8,3.437) 55(-2.2,3.437) 56(-2.6,3.437)
  rect 3.2x3.2 smd: 57(0,0)
  silkscreen extent -4.19,-3.65 3.65,3.65, body extent -3.52,-3.52 3.52,3.52, height 0.85
RESISTOR_0402 [mm] "Resistor 0402"
  rect 0.55x0.75 smd: 1(-0.475,0) 2(0.475,0)
  silkscreen extent -1.02,-0.64 1.02,0.64, body extent -0.5,-0.25 0.5,0.25, height 0.25
RESISTOR_0603 [mil] "Resistor 0603"
  rect 40x45 smd: 1(-33.5,0) 2(33.5,0)
  silkscreen extent -65,-35 65,35, body extent -31,-16 32,16, height 16
RESISTOR_1210 [mm]
  rect 1.15x2.7 smd: 1(-1.651,0) 2(1.651,0)
  silkscreen extent -0.45,-1.25 0.45,1.25, body extent -1.65,-1.35 1.65,1.35, height 0.7
SMD_434123025826 [mm]
  rect 1.05x0.65 smd: A1(-2.075,1.075) A2(2.075,1.075) B1(-2.075,-1.075) B2(2.075,-1.075)
  silkscreen extent -2.1,-1.6 2.1,1.6, body extent -2.3,-1.6 2.3,1.6, height 2.5
"SOIC-8 W25QxJV" [mm] "SOIC, 8-Leads, Body 5.28x5.28mm, Pitch 1.27mm, IPC Medium Density"
  oval 1.7x0.6 smd: 1(-3.55,1.905) 2(-3.55,0.635) 3(-3.55,-0.635) 4(-3.55,-1.905) 5(3.55,-1.905) 6(3.55,-0.635) 7(3.55,0.635) 8(3.55,1.905)
  silkscreen extent -3.67,-2.7 2.3,2.88, body extent -3.95,-2.62 3.95,2.62, height 1.95
"SOT 23-6L" [mm] "SOT23, 6-Leads, Body 2.95x2.80mm, Pitch 0.95mm, IPC Medium Density"
  rect 0.95x0.6 smd: 1(-1.35,0.95) 2(-1.35,0) 3(-1.35,-0.95) 4(1.35,-0.95) 5(1.35,0) 6(1.35,0.95)
  silkscreen extent -1.47,-1.55 0.5,1.93, body extent -1.4,-1.55 1.4,1.55, height 1.45
SOT-23-3 [mil]
  rect 22x50 smd paste+0 mask+4: 1(-37.5,-41) 2(37.5,-41) 3(0,41)
  silkscreen extent -65,-33 65,33, body extent -60,-52 60,52, height 44
SOT-223-4 [mm]
  rect 2.05x1 smd paste+0 mask+0.102: 1(-3.175,2.3) 2(-3.175,0) 3(-3.175,-2.3)
  rect 2.05x3.25 smd paste+0 mask+0.102: 4(3.175,0)
  silkscreen extent -1.96,-3.35 1.3,3.35, body extent -3.5,-3.25 3.5,3.25, height 1.68
SOT-353 [mm]
  rect 0.42x0.6 smd: 1(-0.65,0) 2(0,0) 3(0.65,0) 4(0.65,1.9) 5(-0.65,1.9)
  silkscreen extent -1.17,0.37 1.17,1.55, body extent -0.99,-0.14 1.01,2.06, height 0.96
TC2030-MCP [mil]
  round 31 smd: 1(50,-25) 2(50,25) 3(100,-25) 4(100,25) 5(150,-25) 6(150,25)
  round 34 hole 35 unplated: A(0,0) B(200,40) C(200,-40)
  round 92 hole 93 unplated: D(0,-100) E(125,-100) F(0,100) G(125,100)
  silkscreen extent -55,-155 225,155
TESTPOINT_1.2MM [mm]
  round 1.2 smd: TP(0,0)
TRIM_TC33X-2-203E [mm]
  rect 1.2x1.2 smd: 1(-1.8,1) 3(-1.8,-1)
  rect 1.5x1.6 smd: 2(1.45,0)
  silkscreen extent -3.07,-1.8 1.8,1.8, body extent -1.9,-1.5 1.9,1.5, height 1.1

## Part data
C1: library part "CAP ALUM 22UF 20% 35V SMD", "22 µF 35 V Aluminum Electrolytic Capacitors Radial, Can - SMD 1000 Hrs", Supplier Part Number 1=PCE3952DKR-ND, Voltage=35V, Made By="Robert Pafford", Supplier 1=Digi-Key
C1R C2R: library part CAPACITOR_0.000027uF_0402, "Cap 27pF 50V +/-5% / Ceramic 0402", Supplier Part Number 1=445-5589-1-ND, Tolerance="+/- 5%", Voltage=50V, Made By="Robert Pafford", Supplier 1=Digi-Key
C2: library part CAPACITOR_0.1uF_0603_25V, "Cap 100nF 25V +/-10% / Ceramic 0603", Supplier Part Number 1=1276-1006-1-ND, Tolerance="+/- 10%", Voltage=6.3V, ComponentLink1Description=Datsheet, ComponentLink1URL=https://www.mouser.com/datasheet/2/212/KEM_C1002_X7R_SMD-1102033.pdf, Made By="Flip B", Supplier 1=Digikey
C3: library part "CAP ALUM 10UF 20% 63V SMD", "10 µF 63 V Aluminum - Polymer Capacitors Radial, Can SMD 120mOhm", Max Voltage=63V, Supplier Part Number 1=P15466CT-ND, Tolerance="+/- 20%", Made By="Robert Pafford", Supplier 1=Digi-Key
C3R C5R C6R C7R C8R C9R C10R C12R C13R: library part CAPACITOR_0.1uF_0402, "Cap 100nF 25V +/-10% / Ceramic 0402", Supplier Part Number 1=478-7868-1-ND, Tolerance="+/- 10%", Voltage=25V, Made By="Robert Pafford", Supplier 1=Digi-Key
C4: library part CMP-03422-001523-1, "CAP CER 3900PF 50V X7R 0603", Capacitance=3.9nF, Case Code (Imperial)=0603, Case Code (Metric)=1608, Dielectric=X7R, Max Operating Temperature=125°C, Min Operating Temperature=-55°C, Resistor Type=Ceramic, Tolerance=5%, Voltage Rating=50V, Case/Package=0603, Construction=Flat, Depth=0.8mm, Halogen Free="Halogen Free", Height=0.8mm, Lead Free="Lead Free", Length=1.6mm, Mount="Surface Mount", Packaging="Tape and Reel", Radiation Hardening=No, RoHS Compliant=Yes, Series=CC, Termination=SMD/SMT, Thickness=0.035inch, Voltage Rating (DC)=50V, Width=0.8mm
C4R C5 C11R: library part CAPACITOR_1uF_0402, "Cap 1uF 16V +/-10% / Ceramic 0402", Supplier Part Number 1=478-0402YD105KAT4ADKR-ND, Tolerance="+/- 10%", Voltage=16V, Made By="Robert Pafford", Supplier 1=Digi-Key
C6 C7: library part "CAP ALUM 330UF 20% 50V SMD", "330 µF 50 V Aluminum Electrolytic Capacitors Radial, Can - SMD 120mOhm @ 100kHz 2000 Hrs @ 105°C", Mfr_Name=Panasonic
C8: library part CMP-1038-02030-1, "CAP 1uF 50V ±10% 1210 (3225 Metric) Thickness 2.2mm SMD", Case-EIA=1210, Case-Metric=3225, Rated Voltage="50 V", Tolerance=Â±10%, Max Thickness="2.2 mm", Technology=SMT
C9: library part CMP-2100-03601-2, "CAP CER 0.1UF 50V X7R 0603", Capacitance="100 nF", Manufacturer=YAGEO, Manufacturer Part Number=CC0603KRX7R9BB104, Package=CC0603-DA, Temperature="-55°C to +125°C", Temperature Characteristic=X7R, Temperature Coefficient=15%, Temperature Range High=+125°C, Temperature Range Low=-55°C, Tolerance=0.1, Voltage="50 V", Automotive=No, Category=Cap, ComponentLink2Description=Datasheet, ComponentLink2URL=http://www.yageo.com/documents/recent/UPY-GPHC_X7R_6.3V-to-50V_18.pdf, Device Class L1="Passive Components", Device Class L2=Capacitors, Device Class L3="Ceramic Capacitors", Digikey Description="CAP CER 0.1UF 50V X7R 0603", Footprint Url=http://www.yageo.com/exep/pages/download/literatures/UPY-C_GEN_24.pdf, Height=0.9mm, Lead Free=Yes, Material=Ceramic, Mouser Description="Multilayer Ceramic Capacitor, CC Series, 0.1 - F, - 10%, X7R, 50 V, 0603 [1608 Metric]", Octopart=https://octopart.com/cc0603krx7r9bb104-yageo-42244635, RoHS=TRUE, Voltage Rating="50 V"
C10 C11: library part CMP-04427-001477-1, "General Purpose Ceramic Capacitor, 2220, 10uF, 10%, X7R, 15%, 50V", Capacitance=10uF, Case Code (Imperial)=2220, Case Code (Metric)=5750, Dielectric=X7R, Max Operating Temperature=125°C, Min Operating Temperature=-55°C, Package Quantity=500, Tolerance=10%, Voltage=50V, Case/Package=2220, Construction=Flat, Contact Plating=Tin, Depth=5mm, Dissipation Factor=2.5%, Height=2.79mm, Lead Free="Lead Free", Length=5.7mm, Mount="Surface Mount", Number of Pins=2, Packaging="Tape and Reel", Radiation Hardening=No, REACH SVHC="No SVHC", RoHS Compliant=Yes, Series=Standard, Termination=SMD/SMT, Thickness=0.11inch, Voltage Rating=50V, Voltage Rating (DC)=50V, Width=0.197inch
C12: library part CMP-2007-03642-2, "CAP CER 0.022UF 50V C0G/NP0 0805", Capacitance="22,000 pF", Manufacturer=KEMET, Manufacturer Part Number=C0805C223J5GACTU, Package=C0805C-DN, Temperature="-55°C to +125°C", Temperature Characteristic=C0G, Temperature Coefficient=30ppm/°C, Temperature Range High=+125°C, Temperature Range Low=-55°C, Tolerance=0.05, Voltage Rating="50 V", Automotive=No, Category=Cap, ComponentLink2Description=Datasheet, ComponentLink2URL=https://content.kemet.com/datasheets/KEM_C1003_C0G_SMD.pdf, Device Class L1="Passive Components", Device Class L2=Capacitors, Device Class L3="Ceramic Capacitors", Digikey Description="CAP CER 0.022UF 50V C0G/NP0 0805", Height=0.88mm, Ipc Land Pattern Name=CAPC200125X78, Lead Free=Yes, Material=Ceramic, Mouser Description="Multilayer Ceramic Capacitors MLCC - SMD/SMT 50volts 0.022uF 5% C0G", Octopart=https://octopart.com/c0805c223j5gactu-kemet-9145108, RoHS=TRUE
C13: library part "CAP CER 2.2UF 50V X5R 0603", "2.2 µF ±10% 50V Ceramic Capacitor X5R 0603 (1608 Metric)"
C14: library part "CAP CER 100n 50V 0603", "Ceramic Capacitor, Multilayer, Ceramic, 50V, 10% +Tol, 10% -Tol, X7R, 15% TC, 0.1uF, Surface Mount, 0603", Capacitance=100nF, Capacitor Type=Ceramic, Manufacturer=Yageo, Manufacturer Part Number=CC0603KRX7R9BB104, Max Operating Temperature=125°C, Min Operating Temperature=-55°C, Negative Tolerance=10%, Package Shape=Rectangular, Package Style=SMTMeter, Rated DC Voltage (URdc)=50V, Supplier Part Number 1=9017302, Temperature Characteristics Code=X7R, Category="Ceramic Capacitors", ComponentLink1Description=https://datasheet.ciiva.com:443/pdfs/VipMasterIC/IC/YAGO/YAGO-S-A0003557223/YAGO-S-A0003557223-1.pdf?src-supplier=IHS+Markit, ComponentLink1URL=https://datasheet.ciiva.com:443/pdfs/VipMasterIC/IC/YAGO/YAGO-S-A0003557223/YAGO-S-A0003557223-1.pdf?src-supplier=IHS+Markit, ComponentLink2Description=https://datasheet.ciiva.com/11786/0900766b80d84f1d-11786061.pdf?src-supplier=Rs, ComponentLink2URL=https://datasheet.ciiva.com/11786/0900766b80d84f1d-11786061.pdf?src-supplier=Rs, ComponentLink3Description=https://datasheet.ciiva.com/7978/1489800-7978166.pdf?src-supplier=Element14, ComponentLink3URL=https://datasheet.ciiva.com/7978/1489800-7978166.pdf?src-supplier=Element14, ComponentLink4Description=https://datasheet.ciiva.com/22749/1489800-22749214.pdf?src-supplier=Element14, ComponentLink4URL=https://datasheet.ciiva.com/22749/1489800-22749214.pdf?src-supplier=Element14, ComponentLink5Description=https://datasheet.ciiva.com/31394/1489800-31394927.pdf?src-supplier=Farnell, ComponentLink5URL=https://datasheet.ciiva.com/31394/1489800-31394927.pdf?src-supplier=Farnell, ComponentLink6Description=https://datasheet.ciiva.com/144/mlccorderingcode-144176.pdf?src-supplier=Digikey, ComponentLink6URL=https://datasheet.ciiva.com/144/mlccorderingcode-144176.pdf?src-supplier=Digikey, ComponentLink7Description=https://datasheet.ciiva.com/144/mlccorderingcode-144177.pdf?src-supplier=Digikey, ComponentLink7URL=https://datasheet.ciiva.com/144/mlccorderingcode-144177.pdf?src-supplier=Digikey, ComponentLink8Description=https://datasheet.ciiva.com/144/mlccorderingcode-144178.pdf?src-supplier=Digikey, ComponentLink8URL=https://datasheet.ciiva.com/144/mlccorderingcode-144178.pdf?src-supplier=Digikey, ComponentLink9Description=https://datasheet.ciiva.com/8033/70765-8033819.pdf?src-supplier=Element14, ComponentLink9URL=https://datasheet.ciiva.com/8033/70765-8033819.pdf?src-supplier=Element14, ComponentLink10Description=https://datasheet.ciiva.com/8033/70765-8033821.pdf?src-supplier=Element14, ComponentLink10URL=https://datasheet.ciiva.com/8033/70765-8033821.pdf?src-supplier=Element14, Dielectric Material=Ceramic, Height=0.8mm, JESD-609 Code=e3, Length=1.6mm, Mount="Surface Mount", Multilayer=Yes, Number of Pins=2, Packaging="Tape and Reel", Positive Tolerance=10%, Pricing 1="1=0.1, 15=0.0691, 100=0.0475, 400=0.0317, 2000=0.0133 (USD)", Reach SVHC Compliant=Yes, RoHS=Yes, RoHS Compliant=Yes, Size Code=0603, Stock 1=16646, Supplier 1="Future Electronics", Terminal Finish=Nickel, Termination=Wraparound, Width=0.8mm
C15 C16: library part CAPACITOR_1uF_0603, "Cap 1uF 16V +/-10% / Ceramic 0603", Supplier Part Number 1=C1608X7R1C105K080AC, Tolerance="+/- 10%", Voltage=16V, Made By="Flip B", Supplier 1="Arrow Electronics"
CR1 CR2: library part TVS_Diode_25.5V_16.1A, "TVS DIODE 15.3VWM 25.5VC DO214AC", Mfr_Name=MCC, Copyright="Copyright (C) 2023 Ultra Librarian. All rights reserved.", Manufacturer_Part_Number=SMAJP4KE18A-TP, RefDes=RefDes, Supplier 1="Arrow Electronics", Supplier Part Number 1=SMAJP4KE18A-TP, Type=DEV
CR3: library part "TVS DIODE 5VWM 9.2VC SMB", "9.2V Clamp 65.22A Ipp Tvs Diode Surface Mount SMB", Mfr_Name="Littelfuse Inc"
D1: library part RCLAMP0504S.TCT, "25V Clamp 6A (8/20µs) Ipp Tvs Diode Surface Mount SOT-23-6", Breakdown Voltage (Min)=6V, Clamping Voltage (Max)=25V, Reverse Standoff Voltage (Typ)=5V, Supplier Part Number 1=RCLAMP0504SCT-ND, Made By="Robert Pafford", Supplier 1=Digi-Key
D2: library part LED_RGB_4SMD, "LED RGB CLEAR 4SMD", Blue Forward Current=5mA, Blue Forward Voltage=2.8V, Color=RGB, Package=4-SMD, Red Forward Voltage=1.8V, Supplier Part Number 1=1080-1552-1-ND, ComponentLink1Description=Datasheet, ComponentLink1URL=https://everlightamericas.com/index.php?controller=attachment&id_attachment=3220, Green Forward Current=5mA, Green Forward Voltage=2.8V, Made By="Robert Pafford", Red Forward Current=5mA, Supplier 1=Digi-Key
D3 D4: library part LED_Green_0603_3V, "LED Green Vf= 3V If = 0.005A / IN-S63AT5G", Color=Green, Forward Current=5mA, Forward Voltage=3V, Package=0603, Supplier Part Number 1=1830-1062-1-ND, ComponentLink1Description=Datasheet, ComponentLink1URL=https://www.we-online.de/katalog/datasheet/150060GS75000.pdf, Made By="Robert Pafford", Supplier 1=Digi-Key
D5 D6 D7: library part LED_Yellow_0603, "LED Yellow Vf= 2V If = 0.020A / 150060YS75000", Color=Yellow, Forward Current=20mA, Forward Voltage=2V, Package=0603, Supplier Part Number 1=732-4981-1-ND, Made By="Robert Pafford", Supplier 1=Digi-Key
D8: library part LED_Red_0603, "LED Red Vf= 2V If = 0.020A / 150060RS75000", Color=Red, Forward Current=20mA, Forward Voltage=2V, Package=0603, Supplier Part Number 1=732-4978-1-ND, Made By="Robert Pafford", Supplier 1=Digi-Key
DNP1 DNP2: library part DNP_0402, "Do Not Populate 0402"
J1: library part CONN_MICROUSB, "Amphenol Micro USB-B / USB2.0 5 Pin Right Angle SMD", Color=Silver, Current Per Pin=1.8A, Manufacturer=Amphenol, Supplier Part Number 1=609-4613-1-ND, ComponentLink1Description=Datasheet, ComponentLink1URL=https://cdn.amphenol-icc.com/media/wysiwyg/files/documentation/datasheet/inputoutput/io_usb_micro.pdf?__cf_chl_jschl_tk__=05693735e19256298f6ef6ca2bb2e65c376a4f56-1625503833-0-Abitsb0-ufjOXJYs_S3J3r2iTn-nObalbmXUksF1VvO_h_WEmRdMlUD1I8-hmWSEVWzY1pirKnrPZWfgY3851qyBZe5ZvnNQePLGIzUgdEIQBVUyW36RsbYpDLEWxJ4horD-5gChFgobLYqwmG5aHl0E8lIn_twwPPrOxilK2gP0q9t_CNOs_u5fMqXvXUrlsOv8tIE2NRlu6NVP8qtkL2GjhlkeTUbDMF8WvvpPDTFOgvZ4Y16Ej8F8AhWos88mo5B1HssXozw0XrkJQIqERITUu6rqloz9kf4ZzhBHtDAt-IkiAFY_Ds9SW8FYKKTtINJVpHZQ6Gyu1FFM4Dc9MO0maE8_mmNcwlxqyRoRk_MPWW8VyByXWM5RSp52jteRKw7FeI9WIYvCbPAOy0Eyib-aseIQsnGbglBcUY6_2xp8GYaJM38H3dNvBPsSOfJBPndKedwKHllxjkucXn6xsN0sDXkpGN-cu8_2bDTJ0g-uUucKSCooYX-ApSDNGpkA_p9zv1SOAD8c0zaZVmtiBsN75QpVz2rzq9_BFxOywPvR, Configuration="Right Angle", Created By="Flip B", Number of Positions=5, Pitch=0.65mm, Series=10118192, Supplier 1=Digi-Key
J1R: library part TC2030_SWD, "TagConnect TC2030 ARM SWD 6-pin"
J2: library part CONN_JST_XH254_3POS_VERT, "JST XH 2.54mm Pitch 3 Pos Vertical", Color=White, Current Per Pin=4A, Manufacturer=JST, ComponentLink1Description="Purchase Link", ComponentLink1URL=https://www.amazon.com/460PCS-XH2-54-Connector-Terminal-Connectors/dp/B09DBGVX5C, Configuration=Vertical, Created By="Robert P", NOTE="Do not use JST 2.5mm parts with this footprint. JST does not make 2.54mm pitch pins, rather only clones make this connector!", Number of Positions=3, Pitch=2.54mm, Series="XH 2.54"
J3: library part CONN_JST_XH254_6POS_VERT, "JST XH 2.54mm Pitch 6 Pos Vertical", Color=White, Current Per Pin=4A, Manufacturer=JST, Supplier Part Number 1=455-2264-1-ND, Configuration=Vertical, Created By="Flip B", NOTE="Do not use JST 2.5mm parts with this footprint. JST does not make 2.54mm pitch pins, rather only clones make this connector!", Number of Positions=6, Pitch=2.54mm, Series="XH 2.54", Supplier 1=Digi-Key
J4 J7: library part CONN_JST_XH254_4POS_VERT, "JST XH 2.54mm Pitch 4 Pos Vertical", Color=White, Current Per Pin=4A, Manufacturer=JST, ComponentLink1Description="Purchase Link", ComponentLink1URL=https://www.amazon.com/460PCS-XH2-54-Connector-Terminal-Connectors/dp/B09DBGVX5C, Configuration=Vertical, Created By="Robert P", NOTE="Do not use JST 2.5mm parts with this footprint. JST does not make 2.54mm pitch pins, rather only clones make this connector!", Number of Positions=4, Pitch=2.54mm, Series="XH 2.54"
J5 J6: library part CONN_JST_XH254_2POS_VERT, "JST XH 2.54mm Pitch 2 Pos Vertical", Color=White, Current Per Pin=4A, Manufacturer=JST, ComponentLink1Description="Purchase Link", ComponentLink1URL=https://www.amazon.com/460PCS-XH2-54-Connector-Terminal-Connectors/dp/B09DBGVX5C, Configuration=Vertical, Created By="Robert P", NOTE="Do not use JST 2.5mm parts with this footprint. JST does not make 2.54mm pitch pins, rather only clones make this connector!", Number of Positions=2, Pitch=2.54mm, Series="XH 2.54"
J8: library part CONN_JST_PH_3POS_VERT
Q1: library part TSM500P02CX, "P-Channel 20 V 4.7A (Tc) 1.56W (Tc) Surface Mount SOT-23", Amp Rating="4.7 A", Package="TO-236-3, SC-59, SOT-23-3", Power Dissipation="1.56W (Tc)", Supplier Part Number 1=TSM500P02CXRFGCT-ND, Created By="Robert Pafford", FET Type=P-Channel, Manufacturer_Part_Number=TSM500P02CX, Rds (on)="50mOhm @ 3A, 4.5V", Supplier 1=Digi-Key, Vdss="20 V", Vendor="Taiwan Semiconductor Corporation", Vgs (Max)=±10V, Vgs (th)="800mV @ 250µA"
R1: library part RESISTOR_604_0402, "RES 604 OHM 1% 1/16W 0402", Digikey Part Numer=CR0603-JW-104ELFTR-ND, Supplier Part Number 1=13-AC0402FR-07604RLCT-ND, Tolerance="+/- 1%", Value  (Ohms)=604, Made By="Robert Pafford", Supplier=Digikey, Supplier 1=Digi-Key, Wattage=1/16W
R1R R6R R7R: library part RESISTOR_1K_0402, "RES 1k OHM 1% 1/16W 0402", Digikey Part Numer=CR0603-JW-104ELFTR-ND, Supplier Part Number 1=13-AC0402FR-131KLCT-ND, Tolerance="+/- 1%", Value  (Ohms)=1K, Made By="Robert Pafford", Supplier=Digikey, Supplier 1=Digi-Key, Wattage=1/16W
R2 R3: library part RESISTOR_200_0402, "RES 200 OHM 1% 1/16W 0402", Digikey Part Numer=CR0603-JW-104ELFTR-ND, Supplier Part Number 1=YAG3453CT-ND, Tolerance="+/- 1%", Value  (Ohms)=200, Made By="Robert Pafford", Supplier=Digikey, Supplier 1=Digi-Key, Wattage=1/16W
R2R R3R: library part RESISTOR_27_0402, "RES 27 OHM 1% 1/16W 0402", Digikey Part Numer=CR0603-JW-104ELFTR-ND, Supplier Part Number 1=YAG5278DKR-ND, Tolerance="+/- 1%", Value  (Ohms)=27, Made By="Robert Pafford", Supplier=Digikey, Supplier 1=Digi-Key, Wattage=1/16W
R4: library part "RES SMD 1.1 OHM 1% 1/10W 0603", "1.1 Ohms ±1% 0.1W, 1/10W Chip Resistor 0603 (1608 Metric) Automotive AEC-Q200 Thick Film", Mfr_Name=Vishay
R4R R5R: library part RESISTOR_10K_0402, "RES 10k OHM 1% 1/16W 0402", Digikey Part Numer=CR0603-JW-104ELFTR-ND, Supplier Part Number 1=YAG3436CT-ND, Tolerance="+/- 1%", Value  (Ohms)=10K, Made By="Robert Pafford", Supplier=Digikey, Supplier 1=Digi-Key, Wattage=1/16W
R5: library part "RES 1K OHM 1% 1/10W 0603", "1 kOhms ±1% 0.1W, 1/10W Chip Resistor 0603 (1608 Metric) Automotive AEC-Q200 Thick Film"
R6 R7 R8: library part RESISTOR_1K_0603, "RES 1k OHM 5% 1/8W 0603", Digikey Part Numer=CR0603-JW-104ELFTR-ND, Supplier Part Number 1=2019-RK73B1JTTD102JCT-ND, Tolerance="+/- 5%", Value  (Ohms)="1K DNP", ComponentLink1Description=Datasheet, ComponentLink1URL=https://www.bourns.com/docs/product-datasheets/CRxxxxx.pdf, Made By="Robert Pafford", Supplier=Digikey, Supplier 1=Digi-Key, Wattage=1/8W
R9: "20 kOhms 0.1W, 1/10W J Lead Surface Mount Trimmer Potentiometer Cermet 1 Turn Top Adjustment", Package="1608 Bourns", Supplier Part Number 1=652-TC33X-2-203E, Check_prices=https://www.snapeda.com/parts/TC33X-2-203E/Bourns/view-part/312812/?ref=eda, Digi-Key_Part_Number=TC33X-2-203ECT-ND, MF=Bourns, MP=TC33X-2-203E, Purchase-URL=https://pricing.snapeda.com/search/part/TC33X-2-203E/?ref=eda, SnapEDA_Link=https://www.snapeda.com/parts/TC33X-2-203E/Bourns/view-part/312812/?ref=snap, Supplier 1=Mouser
R10 R11: library part RESISTOR_4.7K_0603, "RES 4.7k OHM 5% 1/10W 0603", Digikey Part Numer=CR0603-JW-104ELFTR-ND, Supplier Part Number 1=RMCF0603JT4K70CT-ND, Tolerance="+/- 5%", Value  (Ohms)=4.7K, Made By="Robert Pafford", Supplier=Digikey, Supplier 1=Digi-Key, Wattage=1/10W
R12 R13 R14 R15: library part RESISTOR_200_0603, "RES 220 OHM 5% 1/8W 0603", Supplier Part Number 1=2019-RK73B1JTTD221JCT-ND, Tolerance="+/- 5%", Value  (Ohms)=220, ComponentLink1Description=Digikey, ComponentLink1URL=https://www.digikey.com/en/products/detail/koa-speer-electronics-inc/RK73B1JTTD101J/9844701, Made By="John S", Supplier 1=Digi-Key, Wattage=1/8W
R16: library part RESISTOR_1.24K_1%_0603, "1.24 kOhms ±1% 0.1W, 1/10W Chip Resistor 0603 (1608 Metric) Automotive AEC-Q200 Thick Film", Supplier Part Number 1=RMCF0603FT1K24CT-ND, Tolerance="+/- 1%", Value (Ohms)=1.24K, Created By="John Ulm", Supplier 1=Digi-Key, Wattage=1/10W
R18 R19: library part "RES 0.12 OHM 1% 1W 1210", "120 mOhms ±1% 1W Chip Resistor 1210 (3225 Metric) Automotive AEC-Q200, Current Sense, Moisture Resistant Thick Film"
R20: library part RESISTOR_100K_0603, "RES 100k OHM 5% 1/10W 0603", Digikey Part Numer=CR0603-JW-104ELFTR-ND, Supplier Part Number 1=CR0603-JW-104ELFCT-ND, Tolerance="+/- 5%", Value  (Ohms)=100K, ComponentLink1Description=Datasheet, ComponentLink1URL=https://www.bourns.com/docs/product-datasheets/CRxxxxx.pdf, Made By="Flip B", Supplier=Digikey, Supplier 1=Digi-Key, Wattage=1/10W
SB1 SB3 SB5 SB8 SB9 SB10 SB11 SB12 SB13 SB14 SB15: library part JUMPER_0_0603, "0 Ohm Jumper No Fit for Solder Bridge", Value  (Ohms)=0, ComponentLink1Description=Digikey, ComponentLink1URL=https://www.digikey.com/en/products/detail/koa-speer-electronics-inc/RK73B1JTTD101J/9844701, Made By="Robert Pafford"
SB2 SB4 SB6 SB7: library part JUMPER_0_0603, "0 Ohm Jumper No Fit for Solder Bridge", Value  (Ohms)="0 DNP", ComponentLink1Description=Digikey, ComponentLink1URL=https://www.digikey.com/en/products/detail/koa-speer-electronics-inc/RK73B1JTTD101J/9844701, Made By="Robert Pafford"
SW1R SW2R: library part "Tactile Switch SMD", "WS-TASV J-Bend SMT Tact Switch, SPST-NO, 16VDC, 50mA, 260g", Manufacturer="Wurth Elektronik", Operating Temperature Max=85°C, Operating Temperature Min=-40°C, Rated Current=50mA, Rated Voltage=16VDC, Category="Tact Switches", Circuit=SPST-NO, ComponentLink1Description="Website Link", ComponentLink1URL=https://www.we-online.com/redexpert/article/434123025826?ad, ComponentLink2Description="Datasheet Link", ComponentLink2URL=https://www.we-online.com/redexpert/spec/434123025826?ad, Contact Material="Stainless Steel", Contact Plating=Silver, Height=2.5mm, Length=4.2mm, Manufacturer Part Number=434123025826, Match Code=WS-TASV, Mount="Surface Mount", Operation Force=260g, Packaging="Tape and Reel", Terminal Material="Copper Alloy", Terminal Plating=Silver, Washable=No, Width=3.2mm
TP1 TP2 TP3 TP4 TP5 TP6 TP7 TP8 TP9: library part TESTPOINT, Made By="Robert Pafford"
U1: library part TLE42744GSV33HTMA1, "Linear Voltage Regulator IC Positive Fixed 1 Output 400mA PG-SOT223-4"
U1R: "Raspberry Pi RP2040", Crystal Frequency="12 MHz", Input Voltage=3.3V, Available Busses="SPI, I2C, PWM, USB", ComponentLink1Description=DigiKey, ComponentLink2Description=Datasheet, ComponentLink2URL=https://datasheets.raspberrypi.org/rp2040/rp2040-datasheet.pdf, Made By="Robert Pafford", Number of GPIOs=29
U2: "Bipolar Motor Driver Power MOSFET Step/Direction, UART 28-QFN (5x5)"
U2R: "IC FLASH 128MBIT SPI/QUAD 8SOIC", Supplier Part Number 1=W25Q128JVSIQ-ND, Made By="Robert Pafford", Size=128M, Supplier 1=Digi-Key
U3: library part LMV331IDCKR, "Comparator General Purpose Open-Collector SC-70-5"
U4: library part SN74LVC2G132DCTR, "NAND Gate IC 2 Channel Schmitt Trigger SM8"
Y1R: library part CRYSTAL_12MHz_SMD_SMALL, "12 MHz ±20ppm Crystal 18pF 100 Ohms 4-SMD, No Lead (3.2x2.5mm)", Frequency="12 MHz", Load Capacitance=18pF, Supplier Part Number 1=2151-RH100-12.000-18-2030-EXT-TRCT-ND, ESR="100 Ohms", Made By="Robert Pafford", Supplier 1=Digi-Key

## Free pads (board coordinates)
  round 60 hole 125.98 unplated: 1(200,200) 1(200,2550) 1(2550,200) 1(2550,2550)

## Via types
v1: diameter 27.56, hole 11.81, Top Layer to Bottom Layer, tented both sides, 79 vias
v2: diameter 36, hole 11, Top Layer to Bottom Layer, tented both sides, 17 vias
v3: diameter 31.5, hole 15.75, Top Layer to Bottom Layer, tented both sides, 3 vias
v4: diameter 32, hole 11, Top Layer to Bottom Layer, tented both sides, 2 vias
v5: diameter 45.28, hole 27.56, Top Layer to Bottom Layer, tented both sides, 2 vias
v6: diameter 24, hole 11, Top Layer to Bottom Layer, tented both sides, 2 vias

## Nets (pads, with @x,y where several pads share a name; then routed paths per layer and width w, separated by ;. In a path a pad name is that pad's centre, name@x,y a point inside that pad or via, vN(x,y) a via of type N, cw(c..) or ccw(c..) an arc to the next point about the centre after c; other vN are vias at no path point)
1v1_RP2040: C11R.1 C12R.1 C13R.1 U1R.23 U1R.45 U1R.50 | length 592.8
  Top Layer w6: v1(1039,709.71) 1042.48,709.71 1056.32,695.87 U1R.45@1078.67,695.87 ; U1R.50@1078.67,617.13 1126.13,617.13 v1(1129,620)
  Top Layer w8: v1(1299,675) 1325.38,648.62 U1R.23@1349.33,648.62
  Bottom Layer w8: C12R.1@994.01,707.89 994.92,708.79 1038.08,708.79 v1(1039,709.71) ; v1@1044,710 1044,704.85 1128.85,620 v1(1129,620) ; C11R.1@1129,587.13 v1(1129,620) ; C13R.1@1299,637.13 v1(1299,675) 1254,630 1143.47,630 1133.47,620 v1(1129,620)